# Altium PCB FullSheetOLD.PcbDoc (part 1 of 8)
Units mm, origin at the board's own origin, x right, y up, seen from the top; angles counter-clockwise.
Board outline 132.46 x 194.44 mm, 4 copper layers (Top Copper, L2_GND, L3_PWR_SIG, Bottom Copper), stack 1.586 mm thick; 495 components, 210 nets, 2171 pads, 1027 vias.
Unrouted connection lines stored in the file: 53.
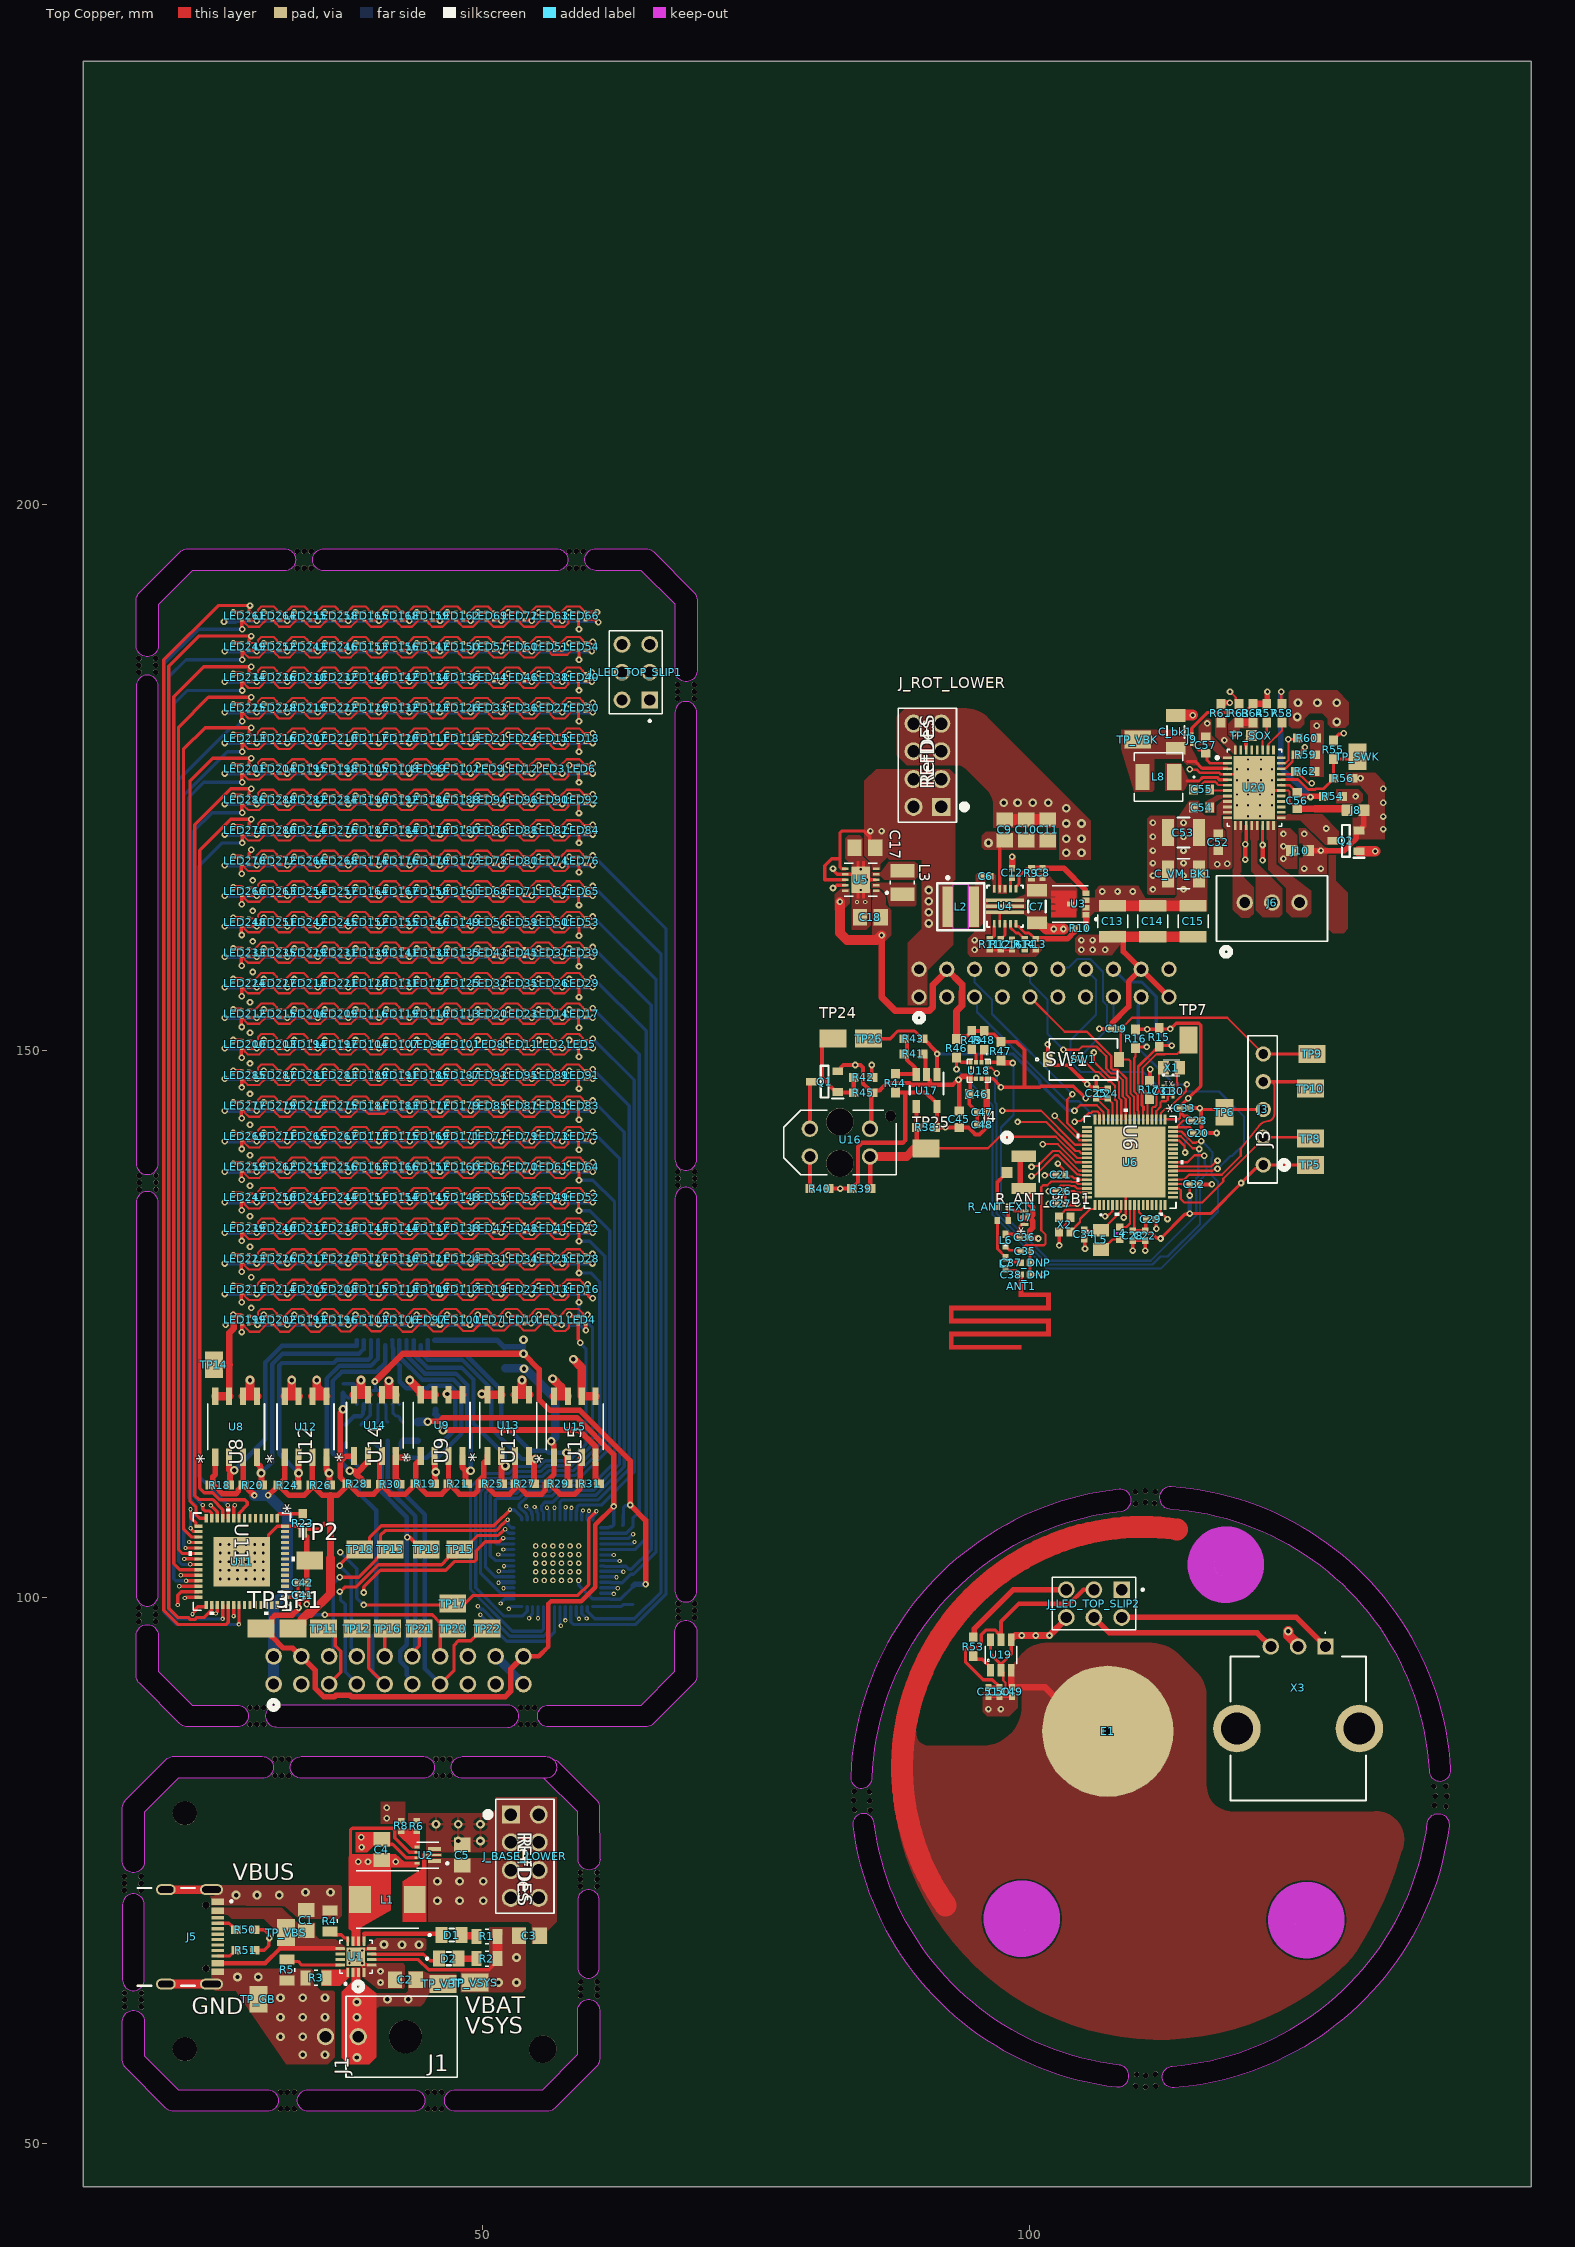
[diagram p0: Top Copper view]
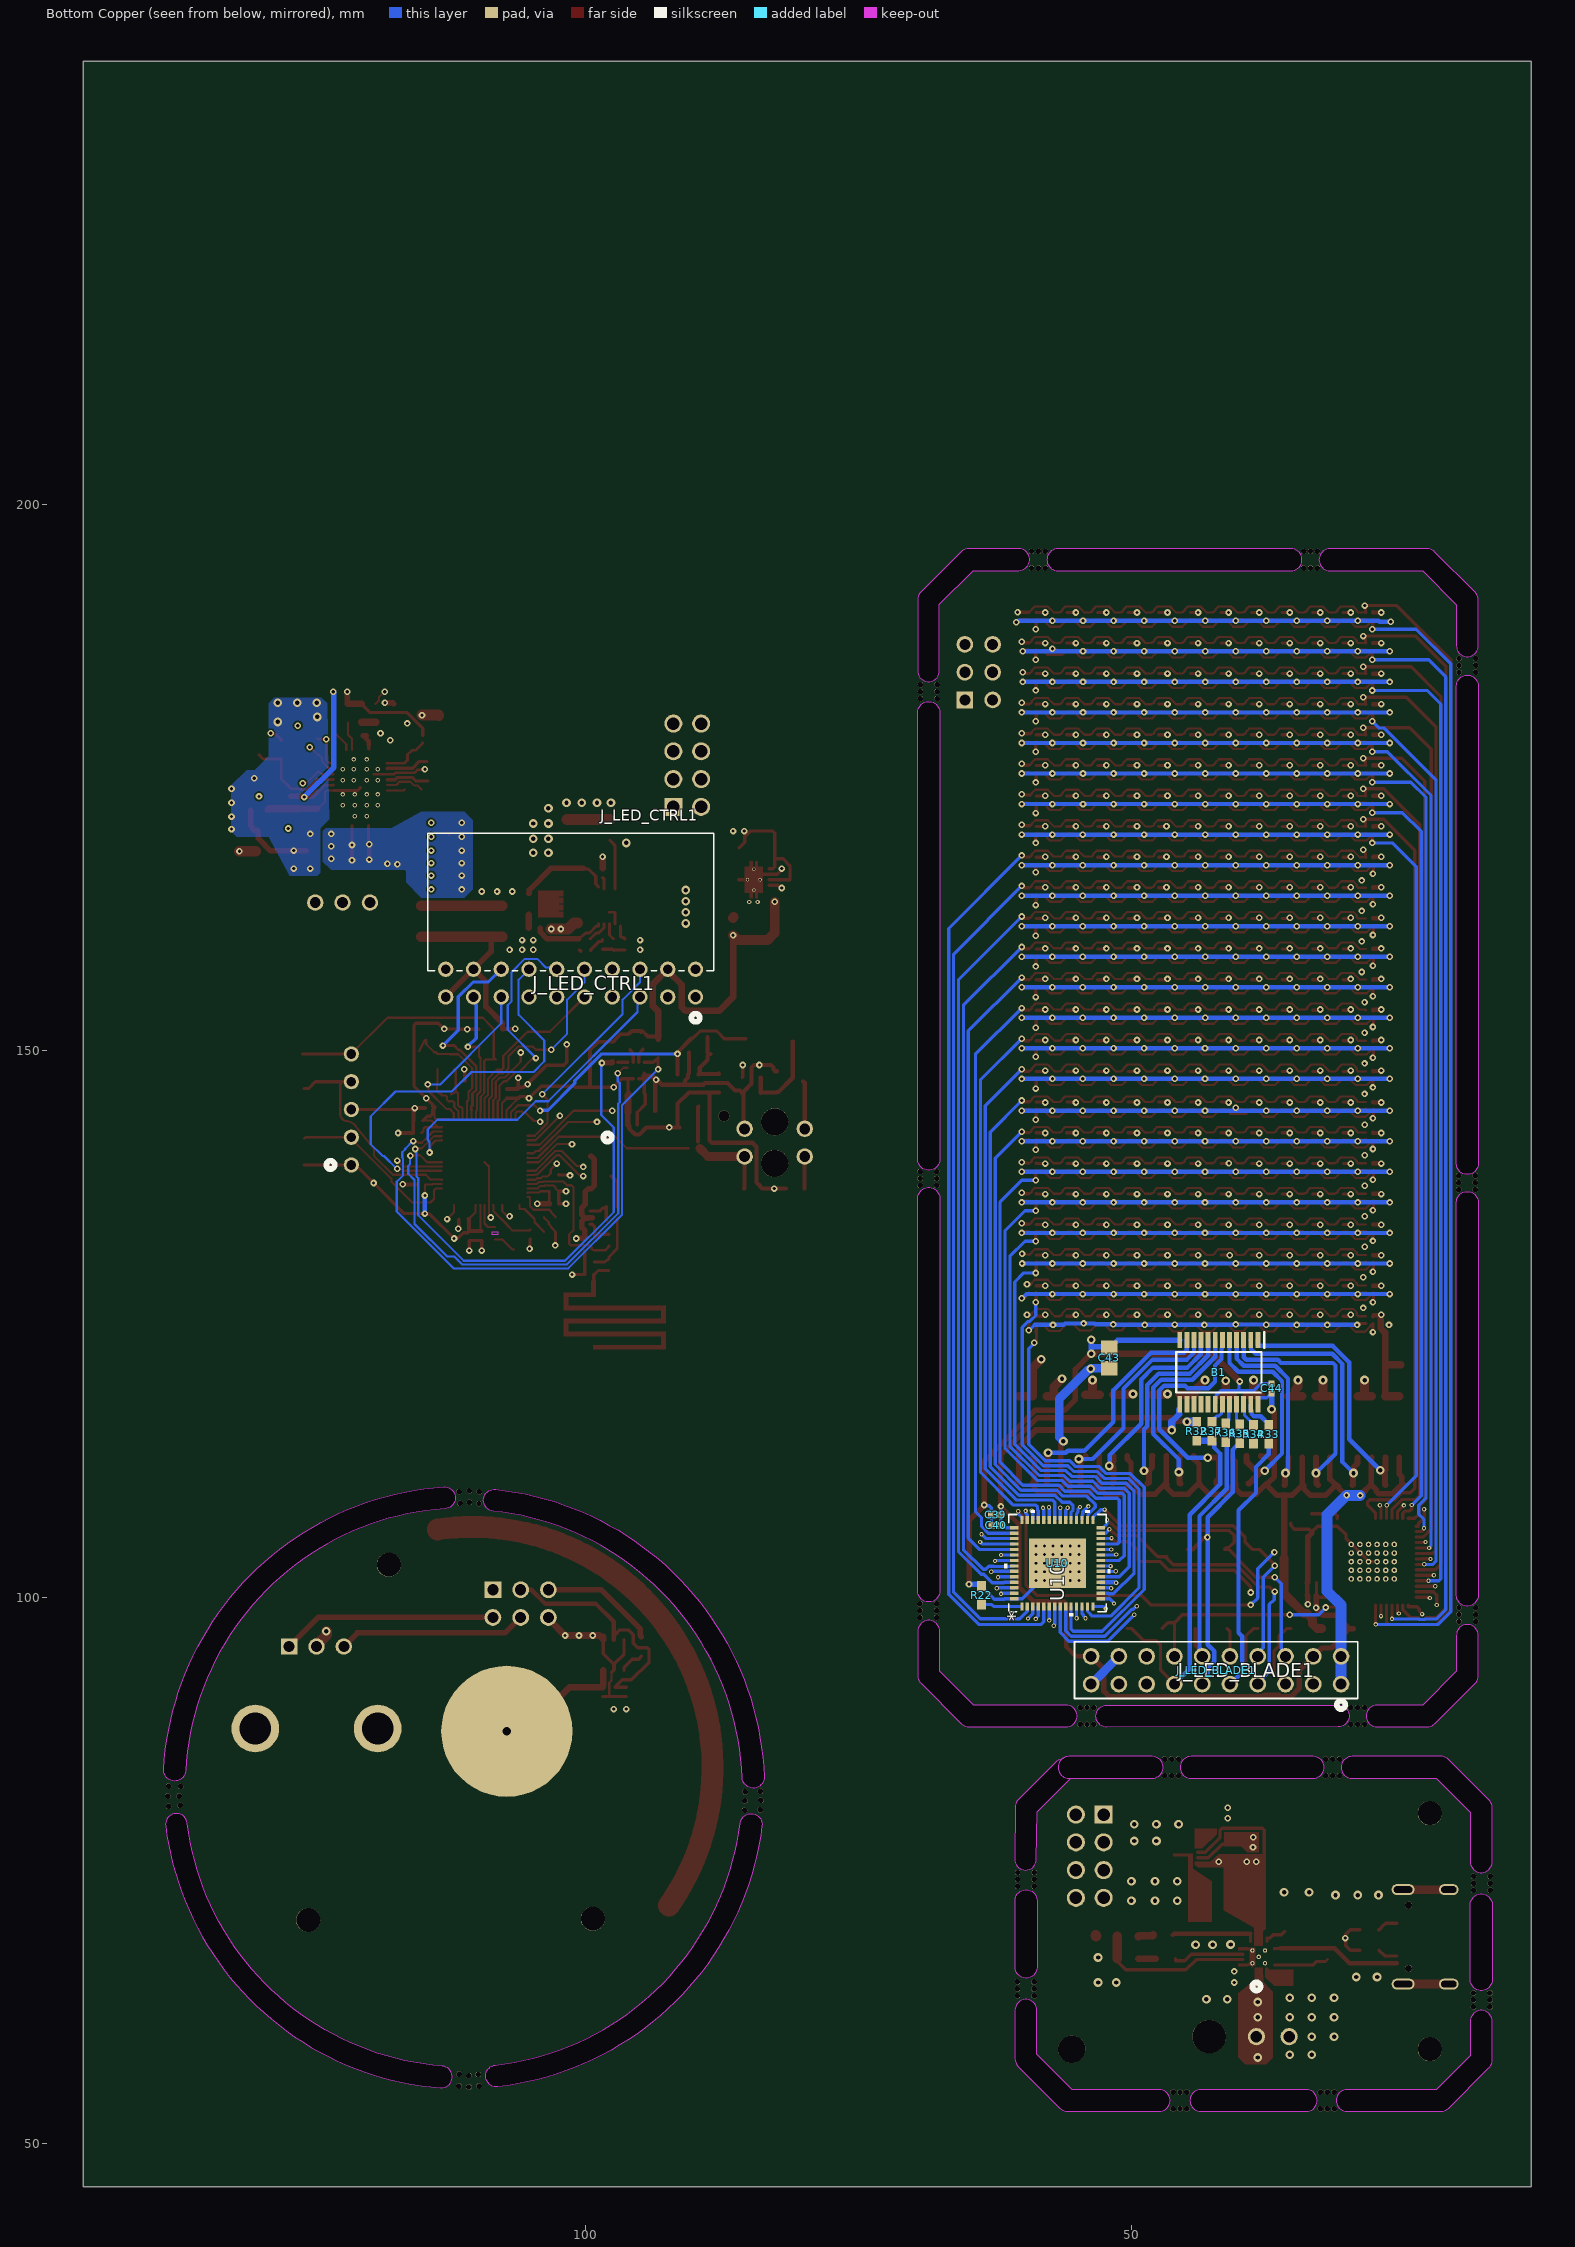
[diagram p1: Bottom Copper view, seen from below]
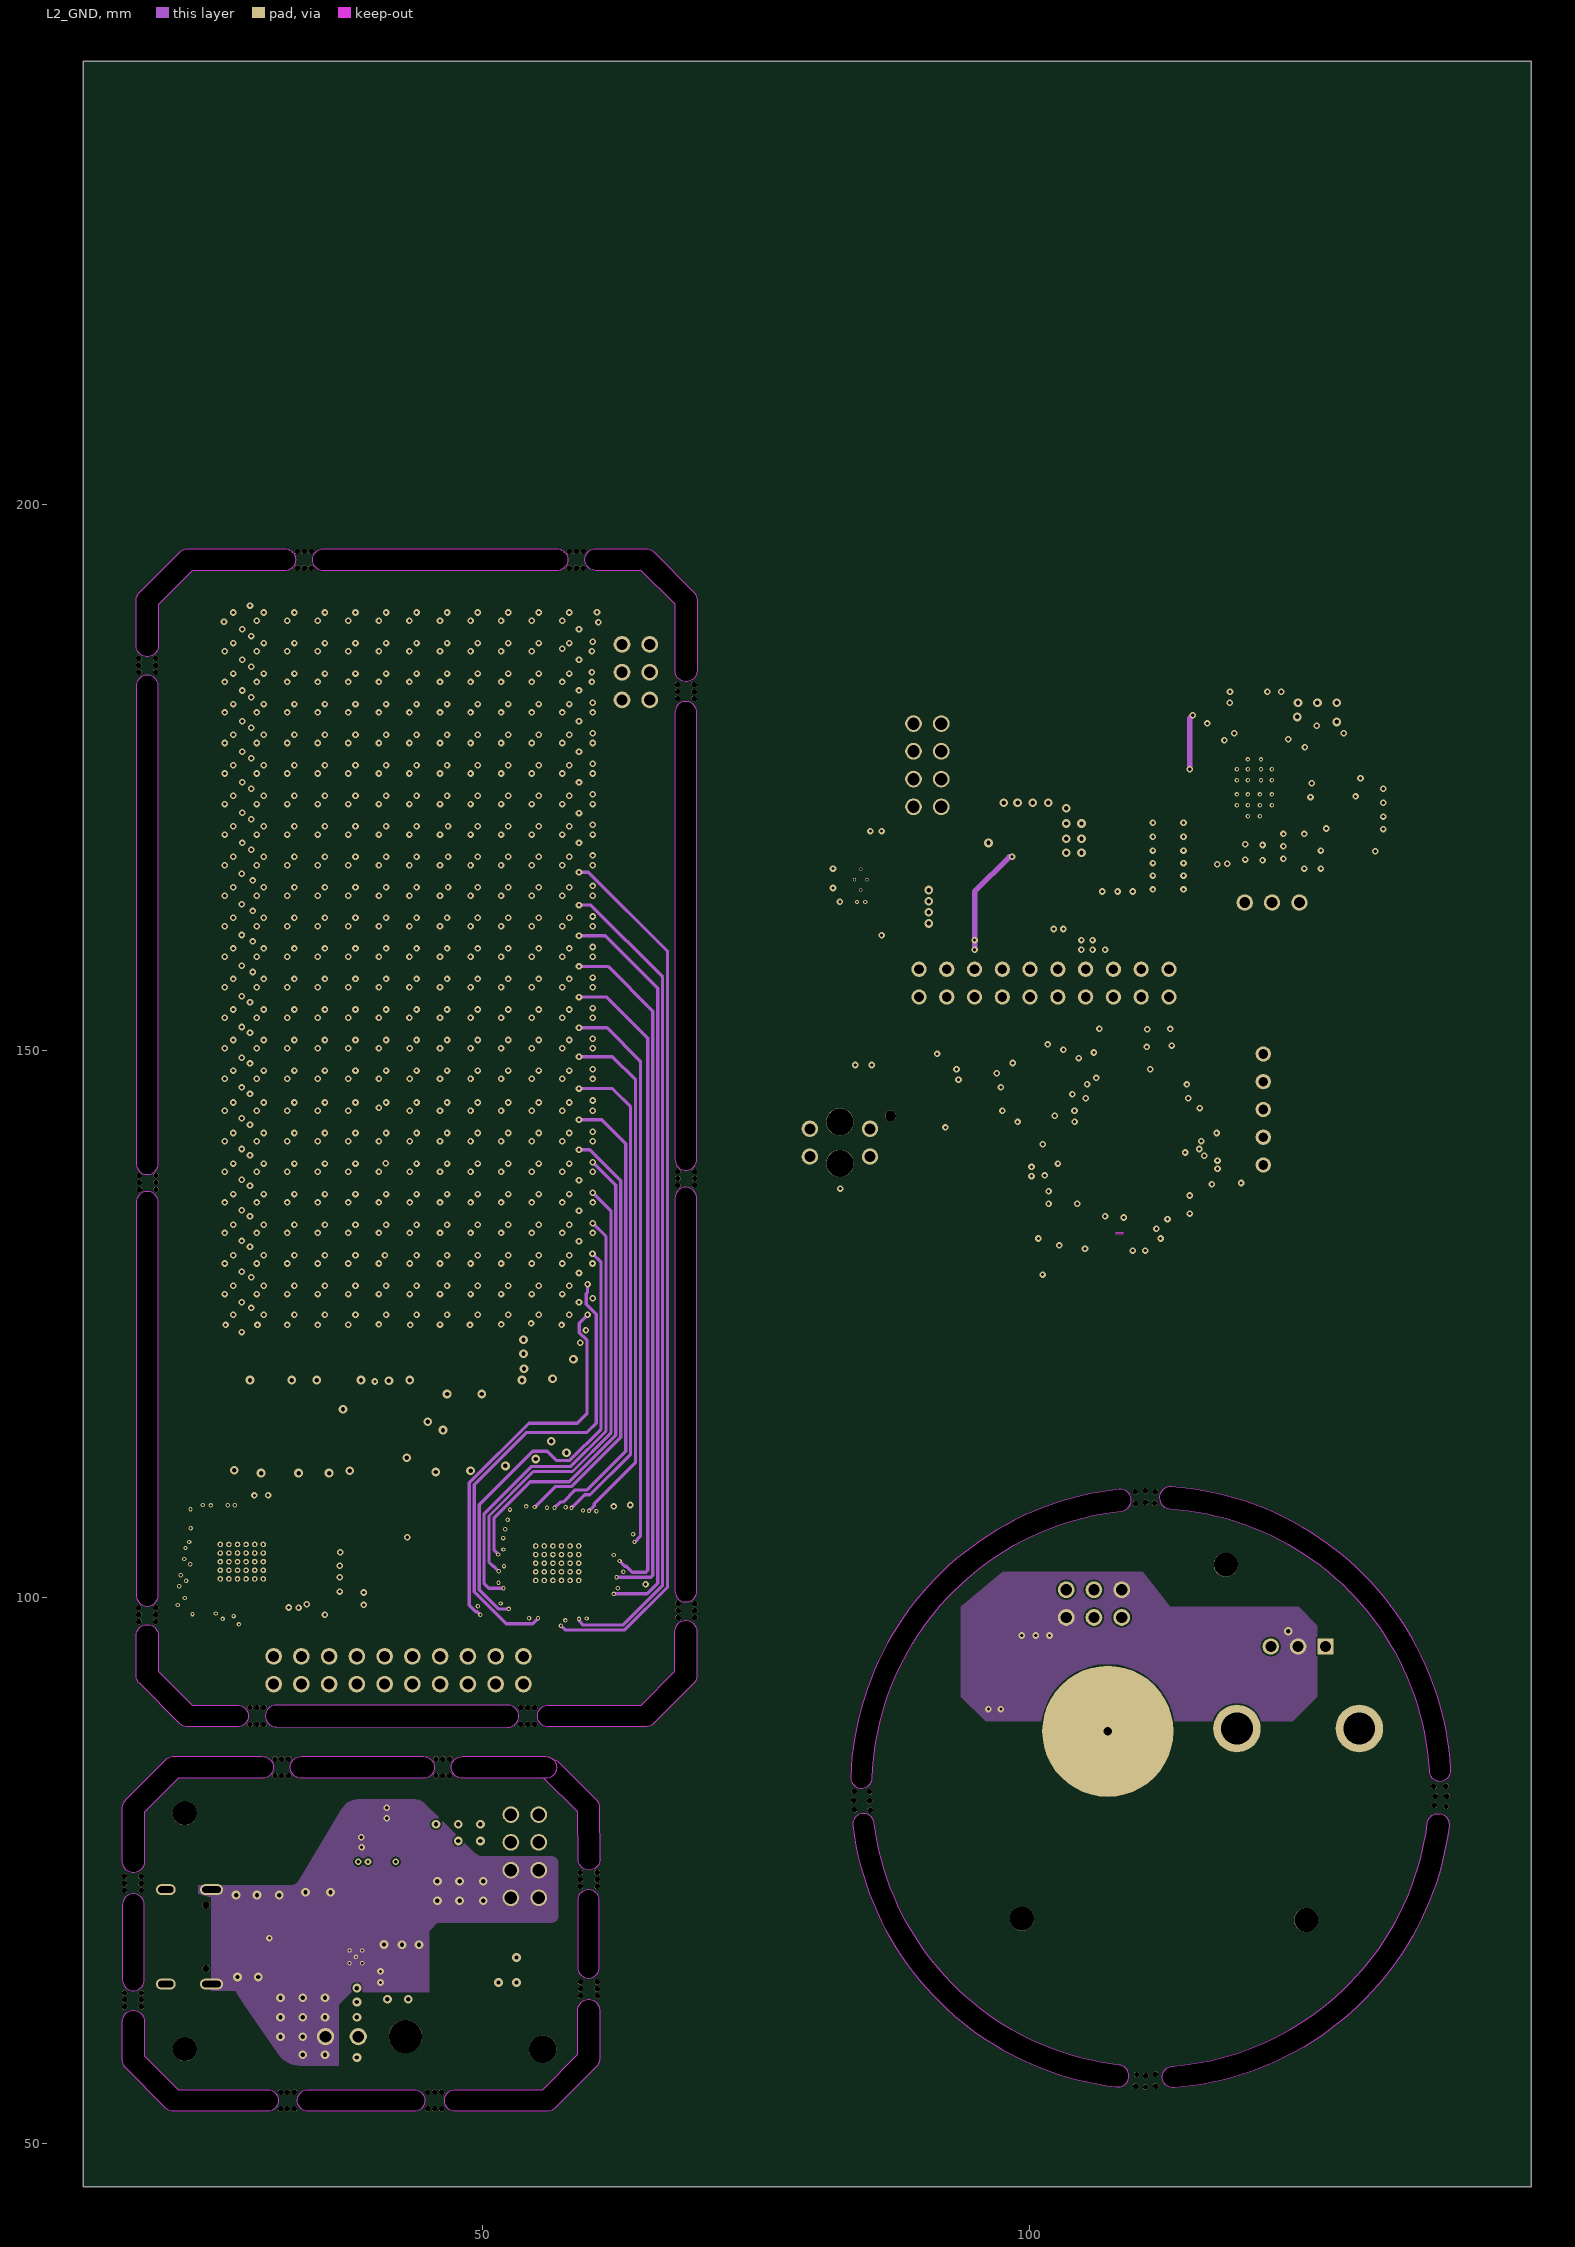
[diagram p2: L2_GND]
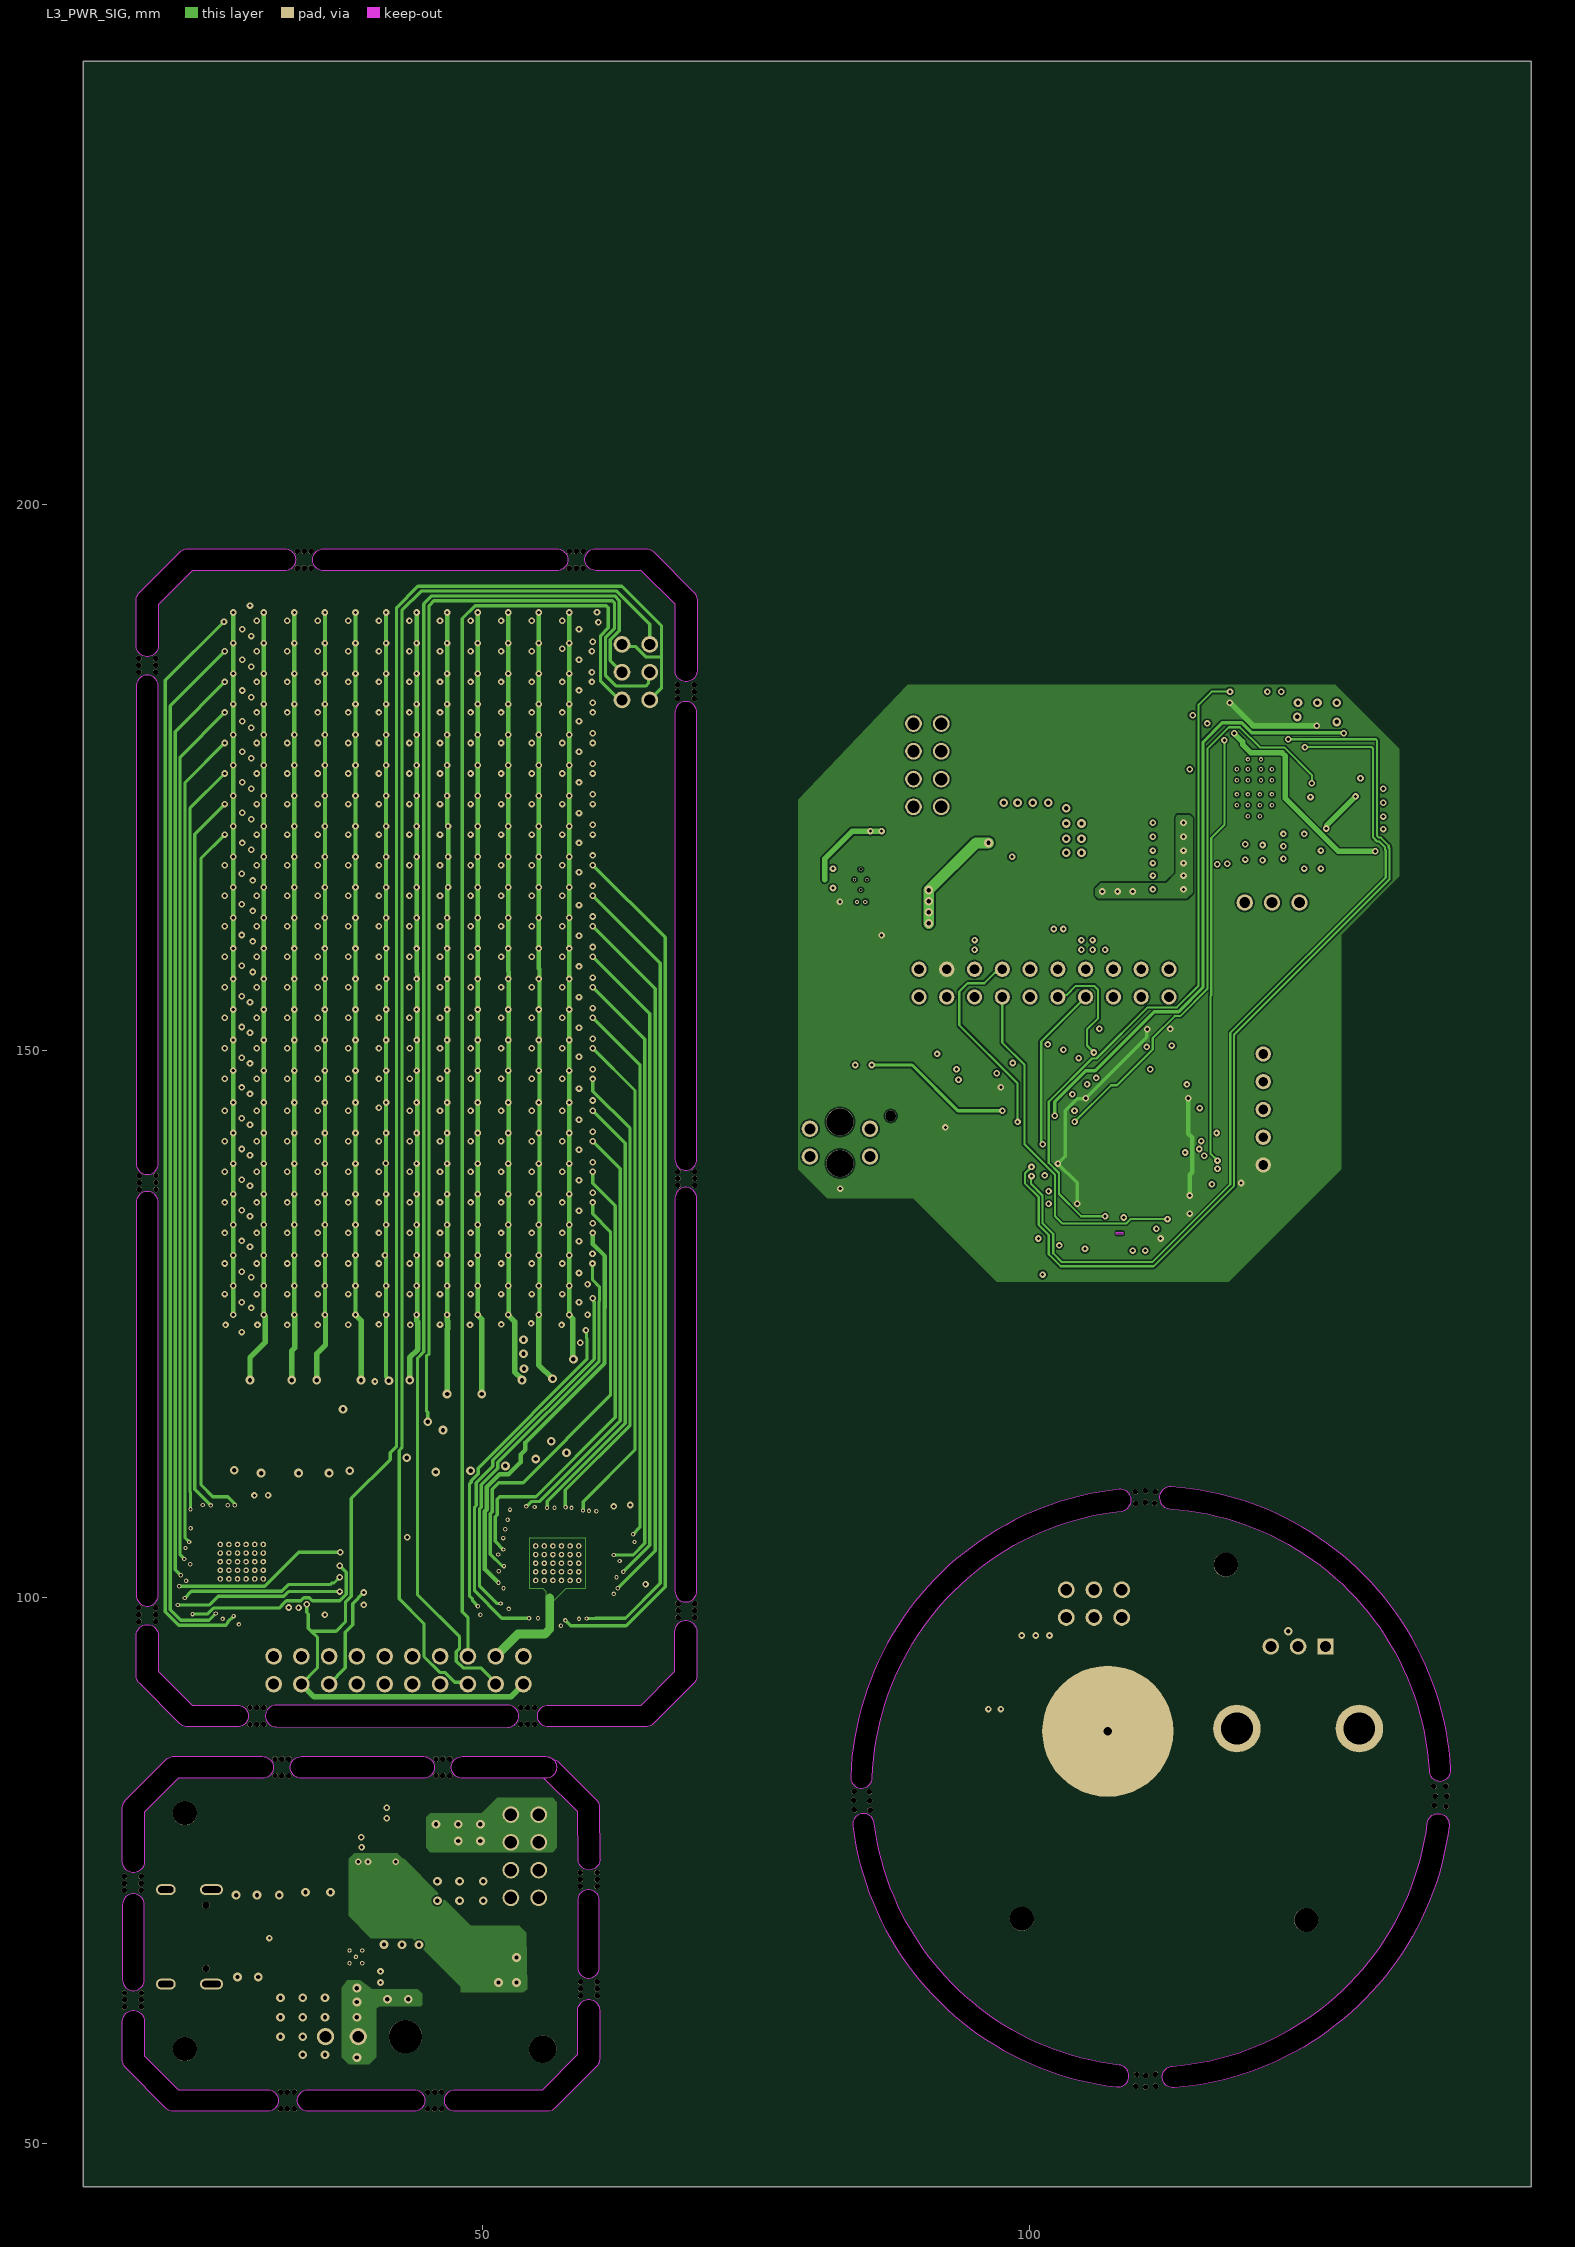
[diagram p3: L3_PWR_SIG]
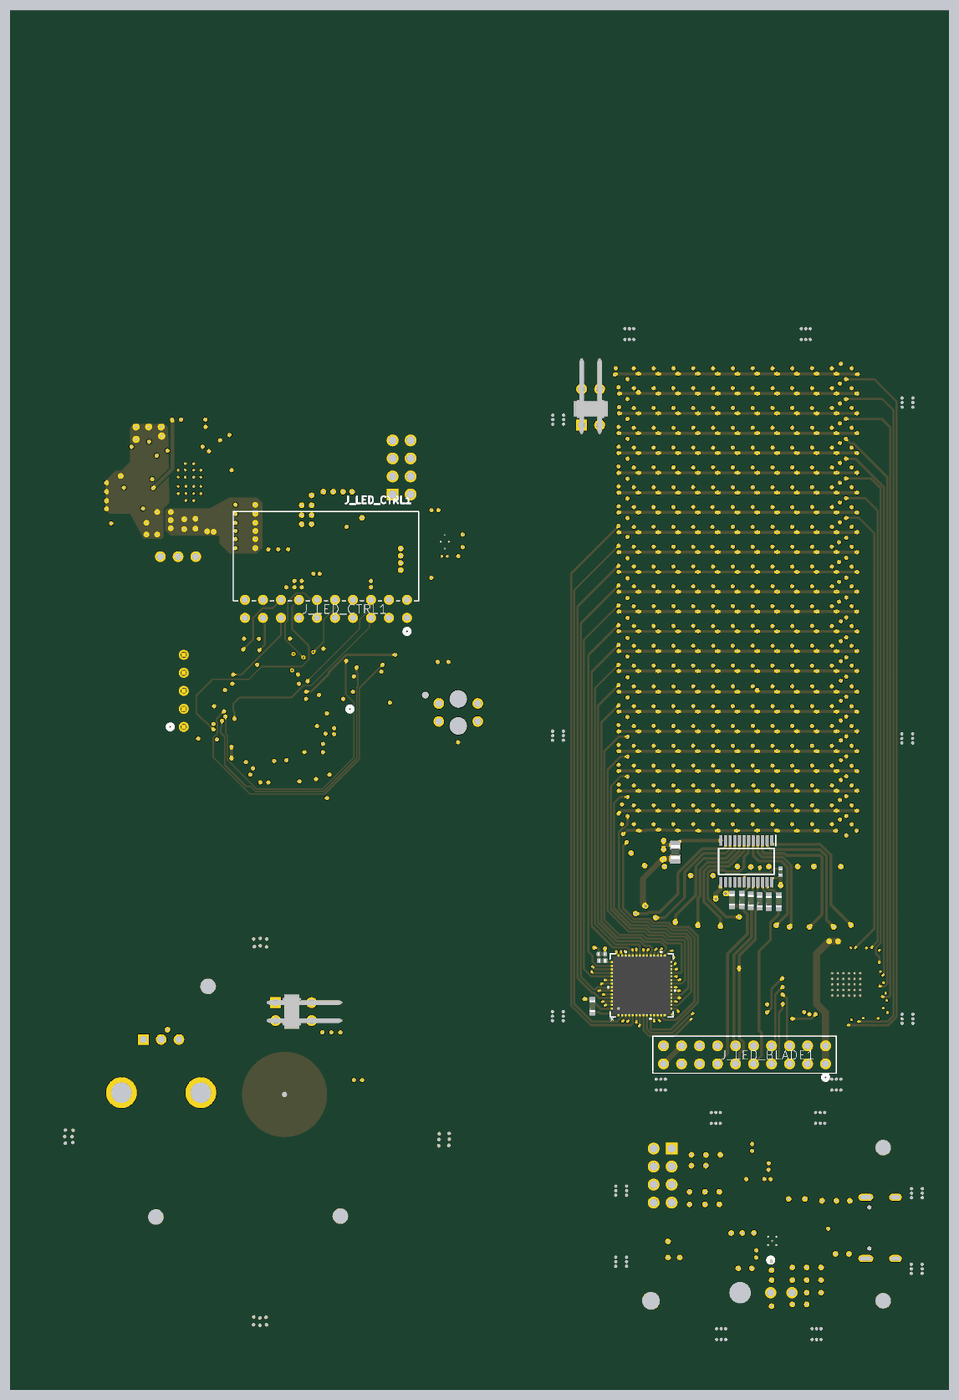
[diagram p10: 3D render of the assembled board from below, using the file's embedded part models]

## Layer stack, top to bottom
Top Mask: solder mask 0.0305, Solder Resist, Dk 3.8
Top Copper: signal copper 0.035
Dielectric 1: prepreg 0.2104, 7628, Dk 4.4
L2_GND: signal copper 0.0152
Core: core 1.065, FR-4, Dk 4.6
L3_PWR_SIG: signal copper 0.0152
Dielectric 2: prepreg 0.2104, 7628, Dk 4.4
Bottom Copper: signal copper 0.035
Bottom Mask: solder mask 0.015, Solder Resist, Dk 3.8

## Board outline
13.462,46.101 13.462,240.538 145.923,240.538 145.923,46.101
cut-out: 67.58,100.584 ccw(c68.58,100.584) 69.58,100.584 69.58,136.525 ccw(c68.58,136.525) 67.58,136.525
cut-out: 67.58,140.081 ccw(c68.58,140.081) 69.58,140.081 69.58,180.975 ccw(c68.58,180.975) 67.58,180.975
cut-out: 56.007,88.154 cw(c56.007,89.154) 56.007,90.154 64.483,90.154 67.58,93.251 67.58,96.901 cw(c68.58,96.901) 69.58,96.901 69.58,92.837 cw(c68.58,92.837) 69.287,92.13 65.604,88.447 cw(c64.897,89.154) 64.897,88.154
cut-out: 31.114,88.156 52.283,88.133 ccw(c52.284,89.134) 53.285,89.134 ccw(c52.284,89.134) 52.285,90.134 31.116,90.157 ccw(c31.115,89.156)
cut-out: 18.597,92.133 cw(c19.304,92.841) 18.304,92.841 18.304,96.52 cw(c19.304,96.52) 20.304,96.52 20.304,93.255 23.405,90.154 27.559,90.154 cw(c27.559,89.154) 28.559,89.154 cw(c27.559,89.154) 27.559,88.154 22.991,88.154 cw(c22.991,89.154) 22.283,88.447
cut-out: 18.304,100.203 ccw(c19.304,100.203) 20.304,100.203 20.304,136.144 ccw(c19.304,136.144) 18.304,136.144
cut-out: 18.304,139.7 ccw(c19.304,139.7) 20.304,139.7 20.304,183.388 ccw(c19.304,183.388) 18.304,183.388
cut-out: 60.347,193.961 cw(c60.347,194.961) 60.347,195.961 64.915,195.961 cw(c64.915,194.961) 65.623,195.668 69.31,191.982 cw(c68.602,191.274) 69.603,191.274 69.603,184.785 cw(c68.602,184.785) 67.602,184.785 67.602,190.86 64.501,193.961
cut-out: 35.433,193.945 cw(c35.433,194.945) 35.433,195.945 56.769,195.945 cw(c56.769,194.945) 57.769,194.945 cw(c56.769,194.945) 56.769,193.945
cut-out: 18.304,187.071 18.304,191.262 cw(c19.304,191.262) 18.597,191.969 22.28,195.652 cw(c22.987,194.945) 22.987,195.945 31.877,195.945 cw(c31.877,194.945) 32.877,194.945 cw(c31.877,194.945) 31.877,193.945 23.401,193.945 20.304,190.848 20.304,187.071 cw(c19.304,187.071)
cut-out: 113.25,55.132 cw(c113.173,56.129) 113.096,57.127 ccw(c111.125,82.55) 136.424,79.357 cw(c137.416,79.232) 138.417,79.232 138.409,79.106 cw(c111.125,82.55)
cut-out: 83.841,79.106 ccw(c111.125,82.55) 108.002,55.227 ccw(c108.116,56.221) 109.116,56.221 ccw(c108.116,56.221) 108.23,57.215 cw(c111.125,82.55) 85.826,79.357 ccw(c84.834,79.232)
cut-out: 83.645,83.597 ccw(c84.644,83.559) 85.644,83.521 cw(c111.125,82.55) 108.43,107.907 ccw(c108.324,108.902) 109.325,108.902 ccw(c108.324,108.902) 108.219,109.896 ccw(c111.125,82.55)
cut-out: 112.837,108.119 cw(c111.125,82.677) 136.582,84.146 ccw(c137.581,84.203) 138.581,84.203 138.58,84.261 ccw(c111.125,82.677) 112.972,110.115 ccw(c112.905,109.117)
cut-out: 112.837,108.119 cw(c111.125,82.677) 136.582,84.146 ccw(c137.581,84.203) 138.581,84.203 138.58,84.261 ccw(c111.125,82.677) 112.972,110.115 ccw(c112.905,109.117)
cut-out: 112.837,108.119 cw(c111.125,82.677) 136.582,84.146 ccw(c137.581,84.203) 138.581,84.203 138.58,84.261 ccw(c111.125,82.677) 112.972,110.115 ccw(c112.905,109.117)
cut-out: 112.837,108.119 cw(c111.125,82.677) 136.582,84.146 ccw(c137.581,84.203) 138.581,84.203 138.58,84.261 ccw(c111.125,82.677) 112.972,110.115 ccw(c112.905,109.117)
cut-out: 58.674,66.167 ccw(c59.674,66.167) 60.675,66.167 60.675,72.263 ccw(c59.674,72.263) 58.674,72.263
cut-out: 17.034,65.024 ccw(c18.034,65.024) 19.034,65.024 19.034,71.882 ccw(c18.034,71.882) 17.034,71.882
cut-out: 17.327,56.951 cw(c18.034,57.658) 17.034,57.658 17.034,61.214 cw(c18.034,61.214) 19.034,61.214 19.034,58.072 22.131,54.975 30.298,54.975 cw(c30.298,53.975) 31.299,53.975 cw(c30.298,53.975) 30.298,52.975 21.717,52.975 cw(c21.717,53.975) 21.01,53.268
cut-out: 34.036,52.975 cw(c34.036,53.975) 34.036,54.975 43.688,54.975 cw(c43.688,53.975) 44.688,53.975 cw(c43.688,53.975) 43.688,52.975
cut-out: 48.133,83.455 cw(c48.133,84.455) 48.133,85.455 55.753,85.455 cw(c55.753,84.455) 56.436,85.186 cw(c56.261,84.201) 56.968,84.908 60.374,81.503 cw(c59.666,80.796) 60.667,80.806 60.725,76.075 60.725,76.063 cw(c59.725,76.063) 58.724,76.051 58.671,80.376 55.593,83.455
cut-out: 48.133,83.455 cw(c48.133,84.455) 48.133,85.455 55.753,85.455 cw(c55.753,84.455) 56.436,85.186 cw(c56.261,84.201) 56.968,84.908 60.374,81.503 cw(c59.666,80.796) 60.667,80.806 60.725,76.075 60.725,76.063 cw(c59.725,76.063) 58.724,76.051 58.671,80.376 55.593,83.455
cut-out: 48.133,83.455 cw(c48.133,84.455) 48.133,85.455 55.753,85.455 cw(c55.753,84.455) 56.753,84.455 cw(c55.753,84.455) 55.753,83.455
cut-out: 33.401,83.455 cw(c33.401,84.455) 33.401,85.455 44.577,85.455 cw(c44.577,84.455) 45.577,84.455 cw(c44.577,84.455) 44.577,83.455
cut-out: 17.034,75.819 17.034,80.772 cw(c18.034,80.772) 17.327,81.479 21.011,85.164 cw(c21.719,84.457) 21.775,85.455 29.845,85.455 cw(c29.845,84.455) 30.845,84.455 cw(c29.845,84.455) 29.845,83.455 22.131,83.455 19.034,80.358 19.034,75.819 cw(c18.034,75.819)
cut-out: 47.498,52.975 cw(c47.498,53.975) 47.498,54.975 55.466,54.975 58.69,58.199 58.69,62.23 cw(c59.69,62.23) 60.69,62.23 60.69,57.785 cw(c59.69,57.785) 60.397,57.078 56.587,53.268 cw(c55.88,53.975) 55.88,52.975

## Design rules (kind name [scope] priority, off if disabled: settings)
BoardOutlineClearance [All] p1: gap=0.3 ignorepadtopadclearanceinfootprint=FALSE
Clearance [All] p1: gap=0.15 ignorepadtopadclearanceinfootprint=TRUE
ComponentClearance "J2 Net Tie Override" [All vs InComponent('J2')] p1: gap=-1 collisioncheckmode=3 verticalgap=0.254 showdistances=FALSE
ComponentClearance [All] p2: gap=0.254 collisioncheckmode=3 verticalgap=0.254 showdistances=FALSE
HoleToHoleClearance [All] p1: gap=0.25 allowstackedmicrovias=TRUE
MinimumAnnularRing [All] p1: minimumring=0.15
MinimumSolderMaskSliver [All] p1: minsoldermaskwidth=0.1
PolygonConnect 5V_BASE_L01_P000 [All vs IsNamedPolygon('5V_BASE_L01_P000')] p1: thpad.connectstyle=Direct thpad.reliefconductorwidth=0.254 thpad.reliefentries=4 thpad.polygonreliefangle="90 Angle" thpad.airgapwidth=0.254 smdpad.connectstyle=Direct smdpad.reliefconductorwidth=0.254 smdpad.reliefentries=4 smdpad.polygonreliefangle="90 Angle" smdpad.airgapwidth=0.254 via.connectstyle=Relief via.reliefconductorwidth=0.254 via.reliefentries=4 via.polygonreliefangle="90 Angle" via.airgapwidth=0.254
PolygonConnect PowerConnect [All vs InNetClass('POWER_DIR')] p2: connectstyle=Direct reliefconductorwidth=0.254 reliefentries=4 polygonreliefangle="90 Angle" airgapwidth=0.254
PolygonConnect [All] p3: connectstyle=Direct reliefconductorwidth=0.254 reliefentries=4 polygonreliefangle="90 Angle" airgapwidth=0.254
RoutingVias [All] p1: holewidth=0.3 width=0.6 viastyle="Through Hole" minholewidth=0.711 minwidth=1.27 maxholewidth=0.711 maxwidth=1.27
SolderMaskExpansion [All] p1: expansion=0.102 istentingtop=FALSE
SupplyNets "Schematic Supply Nets_1" [InNet('GND_ROT')] p1: voltage=0.000
SupplyNets "Schematic Supply Nets_17" [InNet('VBUS')] p2: voltage=0.000
SupplyNets "Schematic Supply Nets_16" [InNet('DGND')] p3: voltage=0.000
SupplyNets "Schematic Supply Nets_15" [InNet('5V_BASE')] p4: voltage=0.000
SupplyNets "Schematic Supply Nets_14" [InNet('GND_TOP')] p5: voltage=0.000
SupplyNets "Schematic Supply Nets_13" [InNet('AGND')] p6: voltage=0.000
SupplyNets "Schematic Supply Nets_12" [InNet('PGND')] p7: voltage=0.000
SupplyNets "Schematic Supply Nets_11" [InNet('VBAT')] p8: voltage=0.000
SupplyNets "Schematic Supply Nets_10" [InNet('GND_LED')] p9: voltage=0.000
SupplyNets "Schematic Supply Nets_8" [InNet('VSYS')] p10: voltage=0.000
SupplyNets "Schematic Supply Nets_7" [InNet('GND_BASE')] p11: voltage=0.000
SupplyNets "Schematic Supply Nets_6" [InNet('+3V3_LED')] p12: voltage=0.000
SupplyNets "Schematic Supply Nets_5" [InNet('VMOTOR_ROT')] p13: voltage=0.000
SupplyNets "Schematic Supply Nets_4" [InNet('+3V3_TOP')] p14: voltage=0.000
SupplyNets "Schematic Supply Nets_3" [InNet('5V_LED')] p15: voltage=0.000
SupplyNets "Schematic Supply Nets_2" [InNet('+3V3_ROT')] p16: voltage=0.000
SupplyNets "Schematic Supply Nets" [InNet('5V_ROT')] p17: voltage=0.000
Width TOUCH_override [InNet('NetC49_2')] p1: maxlimit=2 minlimit=0.254 preferedwidth=0.254 toplayer_minwidth=2 toplayer_prefwidth=2 midlayer1_maxwidth=0.254 midlayer2_maxwidth=0.254 bottomlayer_maxwidth=0.254 minimp=50.000000 maximp=50.000000 favimp=50.000000
Width [All] p2: maxlimit=1 minlimit=0.125 preferedwidth=0.3 minimp=50.000000 maximp=50.000000 favimp=50.000000
27 further rules are at their usual default settings.

## Classes and differential pairs
net class POWER_DIR: 5V_BASE 5V_LED 5V_ROT +3V3_ROT GND_BASE GND_LED GND_ROT MOTOR_U MOTOR_V MOTOR_W NetL3_1 NetL3_2 PGND VBAT VBUS VMOTOR_ROT VSYS
pad class DC_Pad: U1-18 U1-19 U1-20
component class USB: J5 R50 R51
component class SIDE: C49 C50 C51 E1 J_LED_TOP_SLIP2 R53 U19 X3
component class SENS: C45 C46 C47 C48 Q1 R38 R39 R40 R41 R42 R43 R44 R45 R46 R47 R48 R49 TP24 TP25 TP26 U16 U17 U18
component class RF: ANT1 C35 C36 C37_DNP C38_DNP J4 L6 L7 R_ANT_EXT1 R_ANT_PCB1 U7
component class REG: C6 C7 C8 C9 C10 C11 C12 C13 C14 C15 C16 C17 C18 J_BASE_LOWER J_ROT_LOWER L2 L3 R9 R10 R11 R12 R13 R14 U3 U4 U5
component class MTR: C52 C53 C54 C55 C56 C57 C_bk1 C_VM_BK1 J6 J8 J9 J10 L8 Q2 R54 R55 R56 R57 R58 R59 R60 R61 R62 R63 R64 TP_SOX TP_SWK TP_VBK U20
component class MCU: C19 C20 C21 C22 C23 C24 C25 C26 C27 C28 C29 C30 C31 C32 C33 C34 J3 J_LED_CTRL1 L4 L5 R15 R16 R17 SW1 TP5 TP6 TP7 TP8 TP9 TP10 U6 X1 X2
component class LED: B1 C39 C40 C41 C42 C43 C44 J_LED_BLADE1 J_LED_TOP_SLIP1 LED1 LED2 LED3 LED4 LED5 LED6 LED7 LED8 LED9 LED10 LED11 LED12 LED13 LED14 LED15 LED16 LED17 LED18 LED19 LED20 LED21 LED22 LED23 LED24 LED25 LED26 LED27 LED28 LED29 LED30 LED31 LED32 LED33 LED34 LED35 LED36 LED37 LED38 LED39 LED40 LED41 LED42 LED43 LED44 LED45 LED46 LED47 LED48 LED49 LED50 LED51 LED52 LED53 LED54 LED55 LED56 LED57 LED58 LED59 LED60 LED61 LED62 LED63 LED64 LED65 LED66 LED67 LED68 LED69 LED70 LED71 LED72 LED73 LED74 LED75 LED76 LED77 LED78 LED79 LED80 LED81 LED82 LED83 LED84 LED85 LED86 LED87 LED88 LED89 LED90 LED91 LED92 LED93 LED94 LED95 LED96 LED97 LED98 LED99 LED100 LED101 LED102 LED103 LED104 LED105 LED106 LED107 LED108 LED109 LED110 LED111 LED112 LED113 LED114 LED115 LED116 LED117 LED118 LED119 LED120 LED121 LED122 LED123 LED124 LED125 LED126 LED127 LED128 LED129 LED130 LED131 LED132 LED133 LED134 LED135 LED136 LED137 LED138 LED139 LED140 LED141 LED142 LED143 LED144 LED145 LED146 LED147 LED148 LED149 LED150 LED151 LED152 LED153 LED154 LED155 LED156 LED157 LED158 LED159 LED160 LED161 LED162 LED163 LED164 LED165 LED166 LED167 LED168 LED169 LED170 LED171 LED172 LED173 LED174 LED175 LED176 LED177 LED178 LED179 LED180 LED181 LED182 LED183 LED184 LED185 LED186 LED187 LED188 LED189 LED190 LED191 LED192 LED193 LED194 LED195 LED196 LED197 LED198 LED199 LED200 LED201 LED202 LED203 LED204 LED205 LED206 LED207 LED208 LED209 LED210 LED211 LED212 LED213 LED214 LED215 LED216 LED217 LED218 LED219 LED220 LED221 LED222 LED223 LED224 LED225 LED226 LED227 LED228 LED229 LED230 LED231 LED232 LED233 LED234 LED235 LED236 LED237 LED238 LED239 LED240 LED241 LED242 LED243 LED244 LED245 LED246 LED247 LED248 LED249 LED250 LED251 LED252 LED253 LED254 LED255 LED256 LED257 LED258 LED259 LED260 LED261 LED262 LED263 LED264 LED265 LED266 LED267 LED268 LED269 LED270 LED271 LED272 LED273 LED274 LED275 LED276 LED277 LED278 LED279 LED280 LED281 LED282 LED283 LED284 LED285 LED286 LED287 LED288 R18 R19 R20 R21 R22 R23 R24 R25 R26 R27 R28 R29 R30 R31 R32 R33 R34 R35 R36 R37 TP1 TP2 TP3 TP11 TP12 TP13 TP14 TP15 TP16 TP17 TP18 TP19 TP20 TP21 TP22 U8 U9 U10 U11 U12 U13 U14 U15
component class CHG: C1 C2 C3 C4 C5 D1 D2 J1 L1 R1 R2 R3 R4 R5 R6 R8 t TP_GB TP_VBS TP_VBT TP_VSYS U1 U2 VBS

## Components (designator, comment, footprint, x,y, rotation, side; value= is the part's Value field where it differs from the comment)
ANT1 "ANT_2G4" ANT_PCB_MEANDER_2G4_ST_AN5129 99.259,128.495 r180 top
B1 "74HCT154PW_118" SOP65P640X110-24N 42.043,120.616 r270 bottom
C1 "1uF" CAPC2012X70 33.858,70.46 r270 top
C2 "4.7uF" CAPC2012X70 42.926,65.024 r0 top
C3 "4.7uF" CAPC2012X70 54.254,69.063 r180 top
C4 "10uF" CAPC2012X70 40.767,76.937 r270 top
C5 "10uF" CAPC2012X70 48.133,76.429 r90 top
C6 "100nF" FP-AC0402-IPC_B 96.012,165.989 r180 top
C7 "4.7uF" CAPC1206(3216)100_N 100.711,163.219 r90 top
C8 "22nF" FP-AC0402-IPC_B 101.219,166.291 r270 top
C9 "22uF" CAPC2012X70 97.744,170.222 r270 top
C10 "22uF" CAPC2012X70 99.721,170.22 r270 top
C11 "22uF" CAPC2012X70 101.681,170.227 r270 top
C12 "4.7uF" FP-AC0402-IPC_B 98.425,166.291 r270 top
C13 "22uF" G-32_MUR 107.624,161.87 r90 top
C14 "22uF" G-32_MUR 111.307,161.87 r90 top
C15 "22uF" G-32_MUR 114.99,161.87 r90 top
C16 "1nF" FP-AC0402-IPC_B 98.425,159.738 r90 top
C17 "10uF" CAPC2012X70 84.963,168.595 r0 top
C18 "47uF" CAPC2012X70 85.471,162.245 r0 top
C19 "100nF" FP-AC0402-IPC_B 107.95,152.019 r0 top
C20 "4.7uF" FP-AC0402-IPC_B 115.443,142.494 r180 top
C21 "100nF" FP-AC0402-IPC_B 102.87,138.684 r0 top
C22 "100nF" FP-AC0402-IPC_B 110.617,133.096 r90 top
C23 "100nF" FP-AC0402-IPC_B 115.316,143.637 r180 top
C24 "10nF" FP-AC0402-IPC_B 107.188,146.098 r270 top
C25 "1uF" FP-AC0402-IPC_B 106.108,146.116 r270 top
C26 "100pF" FP-AC0402-IPC_B 102.87,137.16 r0 top
C27 "100nF" FP-AC0402-IPC_B 102.87,136.017 r0 top
C28 "4.7uF" FP-AC0402-IPC_B 109.474,133.096 r90 top
C29 "100nF" FP-AC0402-IPC_B 111.125,134.62 r180 top
C30 "10pF" G-033_MUR 113.157,146.304 r270 top
C31 "10pF" G-033_MUR 112.268,146.301 r270 top
C32 "100nF" FP-AC0402-IPC_B 115.11,137.795 r180 top
C33 "100nF" FP-AC0402-IPC_B 114.221,144.78 r180 top
C34 "4.7uF" FP-AC0402-IPC_B 105.029,133.223 r90 top
C35 "0.8pF" FP-AC0402-IPC_B 99.638,131.694 r0 top
C36 "0.3pF" FP-AC0402-IPC_B 99.568,132.969 r180 top
C37_DNP "Cap" FP-AC0402-IPC_B 99.617,130.615 r0 top
C38_DNP "Cap" FP-AC0402-IPC_B 99.619,129.54 r0 top
C39 "4.7uF" FP-AC0402-IPC_B 62.436,107.569 r180 bottom
C40 "100nF" FP-AC0402-IPC_B 62.387,106.601 r180 bottom
C41 "100nF" FP-AC0402-IPC_B 33.528,100.203 r180 top
C42 "4.7uF" FP-AC0402-IPC_B 33.528,101.346 r180 top
C43 "47uF" CAPC2012X70 52.07,121.92 r270 bottom
C44 "100nF" FP-AC0402-IPC_B 37.211,119.126 r270 bottom
C45 "100nF" FP-CC0603-DA-MFG 93.599,143.752 r90 top
C46 "10uF" FP-CC0603-DA-MFG 95.262,146.05 r180 top
C47 "100nF" FP-AC0402-IPC_B 95.679,144.399 r0 top
C48 "100nF" FP-AC0402-IPC_B 95.679,143.256 r0 top
C49 "10pF" FP-AC0402-IPC_B 98.425,91.361 r90 top
C50 "1uF" FP-AC0402-IPC_B 97.282,91.361 r90 top
C51 "100nF" FP-AC0402-IPC_B 96.266,91.361 r90 top
C52 "100nF" FP-CC0603-DA-MFG 117.284,169.1 r90 top
C53 "22uF" G-32_MUR 114.109,169.989 r0 top
C54 "1uF" FP-CC0603-DA-MFG 115.772,172.275 r0 top
C55 "47nF" FP-CC0603-DA-MFG 115.772,173.927 r180 top value="47 nF"
C56 "1uF" FP-CC0603-DA-MFG 124.523,172.91 r270 top
C57 "1uF" FP-CC0603-DA-MFG 116.141,177.99 r270 top
C_bk1 "22uF" CAPC1206(3216)100_N 113.411,179.197 r270 top
C_VM_BK1 "22uF" G-32_MUR 114.109,166.201 r180 top
D1 "LED" LEDC2012X120N 47.142,69.113 r0 top
D2 "LED" LEDC2012X120N 46.899,66.954 r0 top
E1 "Touch-Pad-TTP" Touch_Pad_Surface 107.188,87.757 r0 top
J1 "430450200" CONN_SD-43045-001_02_MOL 38.606,59.817 r90 top
J3 "TSW-105-23-S-S" CON5_1X5_TU_TSW 121.412,144.653 r90 top
J4 "U.FL-R-SMT-1(01)" COAX2_U.FL-R-SMT-101_HIR 99.496,138.889 r270 top
J5 "USB4105-GF-A" GCT_USB4105-GF-A 21.001,68.949 r270 top
J6 "B3B-XH-A" CONN_B3B-XH-A_JST 119.714,163.576 r180 top
J8 "2 way net tie junction" 2WAY_MP 129.857,172.022 r180 top net-tie
J9 "2 way net tie junction" 2WAY_LP 114.871,178.524 r270 top net-tie
J10 "2 way net tie junction" 2WAY_MP 124.777,168.338 r0 top net-tie
J_BASE_LOWER "SLIP_RING_8W" TSW-104-07-G-D_SAI 52.578,80.137 r270 top
J_LED_BLADE1 "SSW-110-01-T-D" CONN_2X10_TU_SSQ_SAI 42.291,93.345 r180 bottom
J_LED_CTRL1 "TSW-110-08-L-D-RA" CON20_2X10_TR_TSW_SAI 101.346,156.21 r180 bottom
J_LED_TOP_SLIP1 "10129381-906002BLF" AMPHENOL_10129381-906002BLF 64.008,184.658 r90 top
J_LED_TOP_SLIP2 "10129381-906002BLF" AMPHENOL_10129381-906002BLF 105.918,99.441 r180 top
J_ROT_LOWER "SLIP_RING_8W" TSW-104-07-G-D_SAI 91.948,172.339 r90 top
L1 "ASPI-0530HI-1R0M-T2" IND_ASPI-0530HI-1R0M-T2 41.275,72.365 r0 top
L2 "WE-MXGI_4020" WE-MXGI_4020 93.726,163.195 r0 top
L3 "LQM2HPN1R5MG0L" INDC2520X100N 88.392,165.42 r90 top
L4 "10nH" IND_LQG15W_MUR 108.27,133.329 r90 top
L5 "10uH" "IND_LQM21FN100M80L_MUR - duplicate" 106.553,132.715 r270 top
L6 "2.7 nH" IND_LQG15_MUR 97.841,132.702 r90 top value=2.7nH
L7 "Ind" IND_LQG15_MUR 97.841,130.556 r270 top
L8 "LQH44PN470MPRL" IND_LQH44PN_PR_MUR 111.823,175.07 r180 top
LED1 "UHD111A-FKA-C3K23E1L3VG5ZB3Z3" SMD4_UHD111A-FKA_CRW 56.27,125.4 r90 top
LED2 "UHD111A-FKA-C3K23E1L3VG5ZB3Z3" SMD4_UHD111A-FKA_CRW 56.27,150.6 r90 top
LED3 "UHD111A-FKA-C3K23E1L3VG5ZB3Z3" SMD4_UHD111A-FKA_CRW 56.27,175.8 r90 top
LED4 "UHD111A-FKA-C3K23E1L3VG5ZB3Z3" SMD4_UHD111A-FKA_CRW 59.07,125.4 r90 top
LED5 "UHD111A-FKA-C3K23E1L3VG5ZB3Z3" SMD4_UHD111A-FKA_CRW 59.07,150.6 r90 top
LED6 "UHD111A-FKA-C3K23E1L3VG5ZB3Z3" SMD4_UHD111A-FKA_CRW 59.07,175.8 r90 top
LED7 "UHD111A-FKA-C3K23E1L3VG5ZB3Z3" SMD4_UHD111A-FKA_CRW 50.67,125.4 r90 top
LED8 "UHD111A-FKA-C3K23E1L3VG5ZB3Z3" SMD4_UHD111A-FKA_CRW 50.67,150.6 r90 top
LED9 "UHD111A-FKA-C3K23E1L3VG5ZB3Z3" SMD4_UHD111A-FKA_CRW 50.67,175.8 r90 top
LED10 "UHD111A-FKA-C3K23E1L3VG5ZB3Z3" SMD4_UHD111A-FKA_CRW 53.47,125.4 r90 top
LED11 "UHD111A-FKA-C3K23E1L3VG5ZB3Z3" SMD4_UHD111A-FKA_CRW 53.47,150.6 r90 top
LED12 "UHD111A-FKA-C3K23E1L3VG5ZB3Z3" SMD4_UHD111A-FKA_CRW 53.47,175.8 r90 top
LED13 "UHD111A-FKA-C3K23E1L3VG5ZB3Z3" SMD4_UHD111A-FKA_CRW 56.27,128.2 r90 top
LED14 "UHD111A-FKA-C3K23E1L3VG5ZB3Z3" SMD4_UHD111A-FKA_CRW 56.27,153.4 r90 top
LED15 "UHD111A-FKA-C3K23E1L3VG5ZB3Z3" SMD4_UHD111A-FKA_CRW 56.27,178.6 r90 top
LED16 "UHD111A-FKA-C3K23E1L3VG5ZB3Z3" SMD4_UHD111A-FKA_CRW 59.07,128.2 r90 top
LED17 "UHD111A-FKA-C3K23E1L3VG5ZB3Z3" SMD4_UHD111A-FKA_CRW 59.07,153.4 r90 top
LED18 "UHD111A-FKA-C3K23E1L3VG5ZB3Z3" SMD4_UHD111A-FKA_CRW 59.07,178.6 r90 top
LED19 "UHD111A-FKA-C3K23E1L3VG5ZB3Z3" SMD4_UHD111A-FKA_CRW 50.67,128.2 r90 top
LED20 "UHD111A-FKA-C3K23E1L3VG5ZB3Z3" SMD4_UHD111A-FKA_CRW 50.67,153.4 r90 top
LED21 "UHD111A-FKA-C3K23E1L3VG5ZB3Z3" SMD4_UHD111A-FKA_CRW 50.67,178.6 r90 top
LED22 "UHD111A-FKA-C3K23E1L3VG5ZB3Z3" SMD4_UHD111A-FKA_CRW 53.47,128.2 r90 top
LED23 "UHD111A-FKA-C3K23E1L3VG5ZB3Z3" SMD4_UHD111A-FKA_CRW 53.47,153.4 r90 top
LED24 "UHD111A-FKA-C3K23E1L3VG5ZB3Z3" SMD4_UHD111A-FKA_CRW 53.47,178.6 r90 top
LED25 "UHD111A-FKA-C3K23E1L3VG5ZB3Z3" SMD4_UHD111A-FKA_CRW 56.27,131 r90 top
LED26 "UHD111A-FKA-C3K23E1L3VG5ZB3Z3" SMD4_UHD111A-FKA_CRW 56.27,156.2 r90 top
LED27 "UHD111A-FKA-C3K23E1L3VG5ZB3Z3" SMD4_UHD111A-FKA_CRW 56.27,181.4 r90 top
LED28 "UHD111A-FKA-C3K23E1L3VG5ZB3Z3" SMD4_UHD111A-FKA_CRW 59.07,131 r90 top
LED29 "UHD111A-FKA-C3K23E1L3VG5ZB3Z3" SMD4_UHD111A-FKA_CRW 59.07,156.2 r90 top
LED30 "UHD111A-FKA-C3K23E1L3VG5ZB3Z3" SMD4_UHD111A-FKA_CRW 59.07,181.4 r90 top
LED31 "UHD111A-FKA-C3K23E1L3VG5ZB3Z3" SMD4_UHD111A-FKA_CRW 50.67,131 r90 top
LED32 "UHD111A-FKA-C3K23E1L3VG5ZB3Z3" SMD4_UHD111A-FKA_CRW 50.67,156.2 r90 top
LED33 "UHD111A-FKA-C3K23E1L3VG5ZB3Z3" SMD4_UHD111A-FKA_CRW 50.67,181.4 r90 top
LED34 "UHD111A-FKA-C3K23E1L3VG5ZB3Z3" SMD4_UHD111A-FKA_CRW 53.47,131 r90 top
LED35 "UHD111A-FKA-C3K23E1L3VG5ZB3Z3" SMD4_UHD111A-FKA_CRW 53.47,156.2 r90 top
LED36 "UHD111A-FKA-C3K23E1L3VG5ZB3Z3" SMD4_UHD111A-FKA_CRW 53.47,181.4 r90 top
LED37 "UHD111A-FKA-C3K23E1L3VG5ZB3Z3" SMD4_UHD111A-FKA_CRW 56.27,159 r90 top
LED38 "UHD111A-FKA-C3K23E1L3VG5ZB3Z3" SMD4_UHD111A-FKA_CRW 56.27,184.2 r90 top
LED39 "UHD111A-FKA-C3K23E1L3VG5ZB3Z3" SMD4_UHD111A-FKA_CRW 59.07,159 r90 top
LED40 "UHD111A-FKA-C3K23E1L3VG5ZB3Z3" SMD4_UHD111A-FKA_CRW 59.07,184.2 r90 top
LED41 "UHD111A-FKA-C3K23E1L3VG5ZB3Z3" SMD4_UHD111A-FKA_CRW 56.27,133.8 r90 top
LED42 "UHD111A-FKA-C3K23E1L3VG5ZB3Z3" SMD4_UHD111A-FKA_CRW 59.07,133.8 r90 top
LED43 "UHD111A-FKA-C3K23E1L3VG5ZB3Z3" SMD4_UHD111A-FKA_CRW 50.67,159 r90 top
LED44 "UHD111A-FKA-C3K23E1L3VG5ZB3Z3" SMD4_UHD111A-FKA_CRW 50.67,184.2 r90 top
LED45 "UHD111A-FKA-C3K23E1L3VG5ZB3Z3" SMD4_UHD111A-FKA_CRW 53.47,159 r90 top
LED46 "UHD111A-FKA-C3K23E1L3VG5ZB3Z3" SMD4_UHD111A-FKA_CRW 53.47,184.2 r90 top
LED47 "UHD111A-FKA-C3K23E1L3VG5ZB3Z3" SMD4_UHD111A-FKA_CRW 50.67,133.8 r90 top
LED48 "UHD111A-FKA-C3K23E1L3VG5ZB3Z3" SMD4_UHD111A-FKA_CRW 53.47,133.8 r90 top
LED49 "UHD111A-FKA-C3K23E1L3VG5ZB3Z3" SMD4_UHD111A-FKA_CRW 56.27,136.6 r90 top
LED50 "UHD111A-FKA-C3K23E1L3VG5ZB3Z3" SMD4_UHD111A-FKA_CRW 56.27,161.8 r90 top
LED51 "UHD111A-FKA-C3K23E1L3VG5ZB3Z3" SMD4_UHD111A-FKA_CRW 56.27,187 r90 top
LED52 "UHD111A-FKA-C3K23E1L3VG5ZB3Z3" SMD4_UHD111A-FKA_CRW 59.07,136.6 r90 top
LED53 "UHD111A-FKA-C3K23E1L3VG5ZB3Z3" SMD4_UHD111A-FKA_CRW 59.07,161.8 r90 top
LED54 "UHD111A-FKA-C3K23E1L3VG5ZB3Z3" SMD4_UHD111A-FKA_CRW 59.07,187 r90 top
LED55 "UHD111A-FKA-C3K23E1L3VG5ZB3Z3" SMD4_UHD111A-FKA_CRW 50.67,136.6 r90 top
LED56 "UHD111A-FKA-C3K23E1L3VG5ZB3Z3" SMD4_UHD111A-FKA_CRW 50.67,161.8 r90 top
LED57 "UHD111A-FKA-C3K23E1L3VG5ZB3Z3" SMD4_UHD111A-FKA_CRW 50.67,187 r90 top
LED58 "UHD111A-FKA-C3K23E1L3VG5ZB3Z3" SMD4_UHD111A-FKA_CRW 53.47,136.6 r90 top
LED59 "UHD111A-FKA-C3K23E1L3VG5ZB3Z3" SMD4_UHD111A-FKA_CRW 53.47,161.8 r90 top
LED60 "UHD111A-FKA-C3K23E1L3VG5ZB3Z3" SMD4_UHD111A-FKA_CRW 53.47,187 r90 top
LED61 "UHD111A-FKA-C3K23E1L3VG5ZB3Z3" SMD4_UHD111A-FKA_CRW 56.27,139.4 r90 top
LED62 "UHD111A-FKA-C3K23E1L3VG5ZB3Z3" SMD4_UHD111A-FKA_CRW 56.27,164.6 r90 top
LED63 "UHD111A-FKA-C3K23E1L3VG5ZB3Z3" SMD4_UHD111A-FKA_CRW 56.27,189.8 r90 top
LED64 "UHD111A-FKA-C3K23E1L3VG5ZB3Z3" SMD4_UHD111A-FKA_CRW 59.07,139.4 r90 top
LED65 "UHD111A-FKA-C3K23E1L3VG5ZB3Z3" SMD4_UHD111A-FKA_CRW 59.07,164.6 r90 top
LED66 "UHD111A-FKA-C3K23E1L3VG5ZB3Z3" SMD4_UHD111A-FKA_CRW 59.07,189.8 r90 top
LED67 "UHD111A-FKA-C3K23E1L3VG5ZB3Z3" SMD4_UHD111A-FKA_CRW 50.67,139.4 r90 top
LED68 "UHD111A-FKA-C3K23E1L3VG5ZB3Z3" SMD4_UHD111A-FKA_CRW 50.67,164.6 r90 top
LED69 "UHD111A-FKA-C3K23E1L3VG5ZB3Z3" SMD4_UHD111A-FKA_CRW 50.67,189.8 r90 top
LED70 "UHD111A-FKA-C3K23E1L3VG5ZB3Z3" SMD4_UHD111A-FKA_CRW 53.47,139.4 r90 top
LED71 "UHD111A-FKA-C3K23E1L3VG5ZB3Z3" SMD4_UHD111A-FKA_CRW 53.47,164.6 r90 top
LED72 "UHD111A-FKA-C3K23E1L3VG5ZB3Z3" SMD4_UHD111A-FKA_CRW 53.47,189.8 r90 top
LED73 "UHD111A-FKA-C3K23E1L3VG5ZB3Z3" SMD4_UHD111A-FKA_CRW 56.27,142.2 r90 top
LED74 "UHD111A-FKA-C3K23E1L3VG5ZB3Z3" SMD4_UHD111A-FKA_CRW 56.27,167.4 r90 top
LED75 "UHD111A-FKA-C3K23E1L3VG5ZB3Z3" SMD4_UHD111A-FKA_CRW 59.07,142.2 r90 top
LED76 "UHD111A-FKA-C3K23E1L3VG5ZB3Z3" SMD4_UHD111A-FKA_CRW 59.07,167.4 r90 top
LED77 "UHD111A-FKA-C3K23E1L3VG5ZB3Z3" SMD4_UHD111A-FKA_CRW 50.67,142.2 r90 top
LED78 "UHD111A-FKA-C3K23E1L3VG5ZB3Z3" SMD4_UHD111A-FKA_CRW 50.67,167.4 r90 top
LED79 "UHD111A-FKA-C3K23E1L3VG5ZB3Z3" SMD4_UHD111A-FKA_CRW 53.47,142.2 r90 top
LED80 "UHD111A-FKA-C3K23E1L3VG5ZB3Z3" SMD4_UHD111A-FKA_CRW 53.47,167.4 r90 top
LED81 "UHD111A-FKA-C3K23E1L3VG5ZB3Z3" SMD4_UHD111A-FKA_CRW 56.27,145 r90 top
LED82 "UHD111A-FKA-C3K23E1L3VG5ZB3Z3" SMD4_UHD111A-FKA_CRW 56.27,170.2 r90 top
LED83 "UHD111A-FKA-C3K23E1L3VG5ZB3Z3" SMD4_UHD111A-FKA_CRW 59.07,145 r90 top
LED84 "UHD111A-FKA-C3K23E1L3VG5ZB3Z3" SMD4_UHD111A-FKA_CRW 59.07,170.2 r90 top
LED85 "UHD111A-FKA-C3K23E1L3VG5ZB3Z3" SMD4_UHD111A-FKA_CRW 50.67,145 r90 top
LED86 "UHD111A-FKA-C3K23E1L3VG5ZB3Z3" SMD4_UHD111A-FKA_CRW 50.67,170.2 r90 top
LED87 "UHD111A-FKA-C3K23E1L3VG5ZB3Z3" SMD4_UHD111A-FKA_CRW 53.47,145 r90 top
LED88 "UHD111A-FKA-C3K23E1L3VG5ZB3Z3" SMD4_UHD111A-FKA_CRW 53.47,170.2 r90 top
LED89 "UHD111A-FKA-C3K23E1L3VG5ZB3Z3" SMD4_UHD111A-FKA_CRW 56.27,147.8 r90 top
LED90 "UHD111A-FKA-C3K23E1L3VG5ZB3Z3" SMD4_UHD111A-FKA_CRW 56.27,173 r90 top
LED91 "UHD111A-FKA-C3K23E1L3VG5ZB3Z3" SMD4_UHD111A-FKA_CRW 59.07,147.8 r90 top
LED92 "UHD111A-FKA-C3K23E1L3VG5ZB3Z3" SMD4_UHD111A-FKA_CRW 59.07,173 r90 top
LED93 "UHD111A-FKA-C3K23E1L3VG5ZB3Z3" SMD4_UHD111A-FKA_CRW 50.67,147.8 r90 top
LED94 "UHD111A-FKA-C3K23E1L3VG5ZB3Z3" SMD4_UHD111A-FKA_CRW 50.67,173 r90 top
LED95 "UHD111A-FKA-C3K23E1L3VG5ZB3Z3" SMD4_UHD111A-FKA_CRW 53.47,147.8 r90 top
LED96 "UHD111A-FKA-C3K23E1L3VG5ZB3Z3" SMD4_UHD111A-FKA_CRW 53.47,173 r90 top
LED97 "UHD111A-FKA-C3K23E1L3VG5ZB3Z3" SMD4_UHD111A-FKA_CRW 45.07,125.4 r90 top
LED98 "UHD111A-FKA-C3K23E1L3VG5ZB3Z3" SMD4_UHD111A-FKA_CRW 45.07,150.6 r90 top
LED99 "UHD111A-FKA-C3K23E1L3VG5ZB3Z3" SMD4_UHD111A-FKA_CRW 45.07,175.8 r90 top
LED100 "UHD111A-FKA-C3K23E1L3VG5ZB3Z3" SMD4_UHD111A-FKA_CRW 47.87,125.4 r90 top
LED101 "UHD111A-FKA-C3K23E1L3VG5ZB3Z3" SMD4_UHD111A-FKA_CRW 47.87,150.6 r90 top
LED102 "UHD111A-FKA-C3K23E1L3VG5ZB3Z3" SMD4_UHD111A-FKA_CRW 47.87,175.8 r90 top
LED103 "UHD111A-FKA-C3K23E1L3VG5ZB3Z3" SMD4_UHD111A-FKA_CRW 39.47,125.4 r90 top
LED104 "UHD111A-FKA-C3K23E1L3VG5ZB3Z3" SMD4_UHD111A-FKA_CRW 39.47,150.6 r90 top
LED105 "UHD111A-FKA-C3K23E1L3VG5ZB3Z3" SMD4_UHD111A-FKA_CRW 39.47,175.8 r90 top
LED106 "UHD111A-FKA-C3K23E1L3VG5ZB3Z3" SMD4_UHD111A-FKA_CRW 42.27,125.4 r90 top
LED107 "UHD111A-FKA-C3K23E1L3VG5ZB3Z3" SMD4_UHD111A-FKA_CRW 42.27,150.6 r90 top
LED108 "UHD111A-FKA-C3K23E1L3VG5ZB3Z3" SMD4_UHD111A-FKA_CRW 42.27,175.8 r90 top
LED109 "UHD111A-FKA-C3K23E1L3VG5ZB3Z3" SMD4_UHD111A-FKA_CRW 45.07,128.2 r90 top
LED110 "UHD111A-FKA-C3K23E1L3VG5ZB3Z3" SMD4_UHD111A-FKA_CRW 45.07,153.4 r90 top
LED111 "UHD111A-FKA-C3K23E1L3VG5ZB3Z3" SMD4_UHD111A-FKA_CRW 45.07,178.6 r90 top
LED112 "UHD111A-FKA-C3K23E1L3VG5ZB3Z3" SMD4_UHD111A-FKA_CRW 47.87,128.2 r90 top
LED113 "UHD111A-FKA-C3K23E1L3VG5ZB3Z3" SMD4_UHD111A-FKA_CRW 47.87,153.4 r90 top
LED114 "UHD111A-FKA-C3K23E1L3VG5ZB3Z3" SMD4_UHD111A-FKA_CRW 47.87,178.6 r90 top
LED115 "UHD111A-FKA-C3K23E1L3VG5ZB3Z3" SMD4_UHD111A-FKA_CRW 39.47,128.2 r90 top
LED116 "UHD111A-FKA-C3K23E1L3VG5ZB3Z3" SMD4_UHD111A-FKA_CRW 39.47,153.4 r90 top
LED117 "UHD111A-FKA-C3K23E1L3VG5ZB3Z3" SMD4_UHD111A-FKA_CRW 39.47,178.6 r90 top
LED118 "UHD111A-FKA-C3K23E1L3VG5ZB3Z3" SMD4_UHD111A-FKA_CRW 42.27,128.2 r90 top
LED119 "UHD111A-FKA-C3K23E1L3VG5ZB3Z3" SMD4_UHD111A-FKA_CRW 42.27,153.4 r90 top
LED120 "UHD111A-FKA-C3K23E1L3VG5ZB3Z3" SMD4_UHD111A-FKA_CRW 42.27,178.6 r90 top
LED121 "UHD111A-FKA-C3K23E1L3VG5ZB3Z3" SMD4_UHD111A-FKA_CRW 45.07,131 r90 top
LED122 "UHD111A-FKA-C3K23E1L3VG5ZB3Z3" SMD4_UHD111A-FKA_CRW 45.07,156.2 r90 top
LED123 "UHD111A-FKA-C3K23E1L3VG5ZB3Z3" SMD4_UHD111A-FKA_CRW 45.07,181.4 r90 top
LED124 "UHD111A-FKA-C3K23E1L3VG5ZB3Z3" SMD4_UHD111A-FKA_CRW 47.87,131 r90 top
LED125 "UHD111A-FKA-C3K23E1L3VG5ZB3Z3" SMD4_UHD111A-FKA_CRW 47.87,156.2 r90 top
LED126 "UHD111A-FKA-C3K23E1L3VG5ZB3Z3" SMD4_UHD111A-FKA_CRW 47.87,181.4 r90 top
LED127 "UHD111A-FKA-C3K23E1L3VG5ZB3Z3" SMD4_UHD111A-FKA_CRW 39.47,131 r90 top
LED128 "UHD111A-FKA-C3K23E1L3VG5ZB3Z3" SMD4_UHD111A-FKA_CRW 39.47,156.2 r90 top
LED129 "UHD111A-FKA-C3K23E1L3VG5ZB3Z3" SMD4_UHD111A-FKA_CRW 39.47,181.4 r90 top
LED130 "UHD111A-FKA-C3K23E1L3VG5ZB3Z3" SMD4_UHD111A-FKA_CRW 42.27,131 r90 top
LED131 "UHD111A-FKA-C3K23E1L3VG5ZB3Z3" SMD4_UHD111A-FKA_CRW 42.27,156.2 r90 top
LED132 "UHD111A-FKA-C3K23E1L3VG5ZB3Z3" SMD4_UHD111A-FKA_CRW 42.27,181.4 r90 top
LED133 "UHD111A-FKA-C3K23E1L3VG5ZB3Z3" SMD4_UHD111A-FKA_CRW 45.07,159 r90 top
LED134 "UHD111A-FKA-C3K23E1L3VG5ZB3Z3" SMD4_UHD111A-FKA_CRW 45.07,184.2 r90 top
LED135 "UHD111A-FKA-C3K23E1L3VG5ZB3Z3" SMD4_UHD111A-FKA_CRW 47.87,159 r90 top
LED136 "UHD111A-FKA-C3K23E1L3VG5ZB3Z3" SMD4_UHD111A-FKA_CRW 47.87,184.2 r90 top
LED137 "UHD111A-FKA-C3K23E1L3VG5ZB3Z3" SMD4_UHD111A-FKA_CRW 45.07,133.8 r90 top
LED138 "UHD111A-FKA-C3K23E1L3VG5ZB3Z3" SMD4_UHD111A-FKA_CRW 47.87,133.8 r90 top
LED139 "UHD111A-FKA-C3K23E1L3VG5ZB3Z3" SMD4_UHD111A-FKA_CRW 39.47,159 r90 top
LED140 "UHD111A-FKA-C3K23E1L3VG5ZB3Z3" SMD4_UHD111A-FKA_CRW 39.47,184.2 r90 top
LED141 "UHD111A-FKA-C3K23E1L3VG5ZB3Z3" SMD4_UHD111A-FKA_CRW 42.27,159 r90 top
LED142 "UHD111A-FKA-C3K23E1L3VG5ZB3Z3" SMD4_UHD111A-FKA_CRW 42.27,184.2 r90 top
LED143 "UHD111A-FKA-C3K23E1L3VG5ZB3Z3" SMD4_UHD111A-FKA_CRW 39.47,133.8 r90 top
LED144 "UHD111A-FKA-C3K23E1L3VG5ZB3Z3" SMD4_UHD111A-FKA_CRW 42.27,133.8 r90 top
LED145 "UHD111A-FKA-C3K23E1L3VG5ZB3Z3" SMD4_UHD111A-FKA_CRW 45.07,136.6 r90 top
LED146 "UHD111A-FKA-C3K23E1L3VG5ZB3Z3" SMD4_UHD111A-FKA_CRW 45.07,161.8 r90 top
LED147 "UHD111A-FKA-C3K23E1L3VG5ZB3Z3" SMD4_UHD111A-FKA_CRW 45.07,187 r90 top
LED148 "UHD111A-FKA-C3K23E1L3VG5ZB3Z3" SMD4_UHD111A-FKA_CRW 47.87,136.6 r90 top
LED149 "UHD111A-FKA-C3K23E1L3VG5ZB3Z3" SMD4_UHD111A-FKA_CRW 47.87,161.8 r90 top
LED150 "UHD111A-FKA-C3K23E1L3VG5ZB3Z3" SMD4_UHD111A-FKA_CRW 47.87,187 r90 top
LED151 "UHD111A-FKA-C3K23E1L3VG5ZB3Z3" SMD4_UHD111A-FKA_CRW 39.47,136.6 r90 top
LED152 "UHD111A-FKA-C3K23E1L3VG5ZB3Z3" SMD4_UHD111A-FKA_CRW 39.47,161.8 r90 top
LED153 "UHD111A-FKA-C3K23E1L3VG5ZB3Z3" SMD4_UHD111A-FKA_CRW 39.47,187 r90 top
LED154 "UHD111A-FKA-C3K23E1L3VG5ZB3Z3" SMD4_UHD111A-FKA_CRW 42.27,136.6 r90 top
LED155 "UHD111A-FKA-C3K23E1L3VG5ZB3Z3" SMD4_UHD111A-FKA_CRW 42.27,161.8 r90 top
LED156 "UHD111A-FKA-C3K23E1L3VG5ZB3Z3" SMD4_UHD111A-FKA_CRW 42.27,187 r90 top
LED157 "UHD111A-FKA-C3K23E1L3VG5ZB3Z3" SMD4_UHD111A-FKA_CRW 45.07,139.4 r90 top
LED158 "UHD111A-FKA-C3K23E1L3VG5ZB3Z3" SMD4_UHD111A-FKA_CRW 45.07,164.6 r90 top
LED159 "UHD111A-FKA-C3K23E1L3VG5ZB3Z3" SMD4_UHD111A-FKA_CRW 45.07,189.8 r90 top
LED160 "UHD111A-FKA-C3K23E1L3VG5ZB3Z3" SMD4_UHD111A-FKA_CRW 47.87,139.4 r90 top
LED161 "UHD111A-FKA-C3K23E1L3VG5ZB3Z3" SMD4_UHD111A-FKA_CRW 47.87,164.6 r90 top
LED162 "UHD111A-FKA-C3K23E1L3VG5ZB3Z3" SMD4_UHD111A-FKA_CRW 47.87,189.8 r90 top
LED163 "UHD111A-FKA-C3K23E1L3VG5ZB3Z3" SMD4_UHD111A-FKA_CRW 39.47,139.4 r90 top
LED164 "UHD111A-FKA-C3K23E1L3VG5ZB3Z3" SMD4_UHD111A-FKA_CRW 39.47,164.6 r90 top
LED165 "UHD111A-FKA-C3K23E1L3VG5ZB3Z3" SMD4_UHD111A-FKA_CRW 39.47,189.8 r90 top
LED166 "UHD111A-FKA-C3K23E1L3VG5ZB3Z3" SMD4_UHD111A-FKA_CRW 42.27,139.4 r90 top
LED167 "UHD111A-FKA-C3K23E1L3VG5ZB3Z3" SMD4_UHD111A-FKA_CRW 42.27,164.6 r90 top
LED168 "UHD111A-FKA-C3K23E1L3VG5ZB3Z3" SMD4_UHD111A-FKA_CRW 42.27,189.8 r90 top
LED169 "UHD111A-FKA-C3K23E1L3VG5ZB3Z3" SMD4_UHD111A-FKA_CRW 45.07,142.2 r90 top
LED170 "UHD111A-FKA-C3K23E1L3VG5ZB3Z3" SMD4_UHD111A-FKA_CRW 45.07,167.4 r90 top
LED171 "UHD111A-FKA-C3K23E1L3VG5ZB3Z3" SMD4_UHD111A-FKA_CRW 47.87,142.2 r90 top
LED172 "UHD111A-FKA-C3K23E1L3VG5ZB3Z3" SMD4_UHD111A-FKA_CRW 47.87,167.4 r90 top
LED173 "UHD111A-FKA-C3K23E1L3VG5ZB3Z3" SMD4_UHD111A-FKA_CRW 39.47,142.2 r90 top
LED174 "UHD111A-FKA-C3K23E1L3VG5ZB3Z3" SMD4_UHD111A-FKA_CRW 39.47,167.4 r90 top
LED175 "UHD111A-FKA-C3K23E1L3VG5ZB3Z3" SMD4_UHD111A-FKA_CRW 42.27,142.2 r90 top
LED176 "UHD111A-FKA-C3K23E1L3VG5ZB3Z3" SMD4_UHD111A-FKA_CRW 42.27,167.4 r90 top
LED177 "UHD111A-FKA-C3K23E1L3VG5ZB3Z3" SMD4_UHD111A-FKA_CRW 45.07,145 r90 top
LED178 "UHD111A-FKA-C3K23E1L3VG5ZB3Z3" SMD4_UHD111A-FKA_CRW 45.07,170.2 r90 top
LED179 "UHD111A-FKA-C3K23E1L3VG5ZB3Z3" SMD4_UHD111A-FKA_CRW 47.87,145 r90 top
LED180 "UHD111A-FKA-C3K23E1L3VG5ZB3Z3" SMD4_UHD111A-FKA_CRW 47.87,170.2 r90 top
LED181 "UHD111A-FKA-C3K23E1L3VG5ZB3Z3" SMD4_UHD111A-FKA_CRW 39.47,145 r90 top
LED182 "UHD111A-FKA-C3K23E1L3VG5ZB3Z3" SMD4_UHD111A-FKA_CRW 39.47,170.2 r90 top
LED183 "UHD111A-FKA-C3K23E1L3VG5ZB3Z3" SMD4_UHD111A-FKA_CRW 42.27,145 r90 top
LED184 "UHD111A-FKA-C3K23E1L3VG5ZB3Z3" SMD4_UHD111A-FKA_CRW 42.27,170.2 r90 top
LED185 "UHD111A-FKA-C3K23E1L3VG5ZB3Z3" SMD4_UHD111A-FKA_CRW 45.07,147.8 r90 top
LED186 "UHD111A-FKA-C3K23E1L3VG5ZB3Z3" SMD4_UHD111A-FKA_CRW 45.07,173 r90 top
LED187 "UHD111A-FKA-C3K23E1L3VG5ZB3Z3" SMD4_UHD111A-FKA_CRW 47.87,147.8 r90 top
LED188 "UHD111A-FKA-C3K23E1L3VG5ZB3Z3" SMD4_UHD111A-FKA_CRW 47.87,173 r90 top
LED189 "UHD111A-FKA-C3K23E1L3VG5ZB3Z3" SMD4_UHD111A-FKA_CRW 39.47,147.8 r90 top
LED190 "UHD111A-FKA-C3K23E1L3VG5ZB3Z3" SMD4_UHD111A-FKA_CRW 39.47,173 r90 top
LED191 "UHD111A-FKA-C3K23E1L3VG5ZB3Z3" SMD4_UHD111A-FKA_CRW 42.27,147.8 r90 top
LED192 "UHD111A-FKA-C3K23E1L3VG5ZB3Z3" SMD4_UHD111A-FKA_CRW 42.27,173 r90 top
LED193 "UHD111A-FKA-C3K23E1L3VG5ZB3Z3" SMD4_UHD111A-FKA_CRW 33.87,125.4 r90 top
LED194 "UHD111A-FKA-C3K23E1L3VG5ZB3Z3" SMD4_UHD111A-FKA_CRW 33.87,150.6 r90 top
LED195 "UHD111A-FKA-C3K23E1L3VG5ZB3Z3" SMD4_UHD111A-FKA_CRW 33.87,175.8 r90 top
LED196 "UHD111A-FKA-C3K23E1L3VG5ZB3Z3" SMD4_UHD111A-FKA_CRW 36.67,125.4 r90 top
LED197 "UHD111A-FKA-C3K23E1L3VG5ZB3Z3" SMD4_UHD111A-FKA_CRW 36.67,150.6 r90 top
LED198 "UHD111A-FKA-C3K23E1L3VG5ZB3Z3" SMD4_UHD111A-FKA_CRW 36.67,175.8 r90 top
LED199 "UHD111A-FKA-C3K23E1L3VG5ZB3Z3" SMD4_UHD111A-FKA_CRW 28.27,125.4 r90 top
LED200 "UHD111A-FKA-C3K23E1L3VG5ZB3Z3" SMD4_UHD111A-FKA_CRW 28.27,150.6 r90 top
LED201 "UHD111A-FKA-C3K23E1L3VG5ZB3Z3" SMD4_UHD111A-FKA_CRW 28.27,175.8 r90 top
LED202 "UHD111A-FKA-C3K23E1L3VG5ZB3Z3" SMD4_UHD111A-FKA_CRW 31.07,125.4 r90 top
LED203 "UHD111A-FKA-C3K23E1L3VG5ZB3Z3" SMD4_UHD111A-FKA_CRW 31.07,150.6 r90 top
LED204 "UHD111A-FKA-C3K23E1L3VG5ZB3Z3" SMD4_UHD111A-FKA_CRW 31.07,175.8 r90 top
LED205 "UHD111A-FKA-C3K23E1L3VG5ZB3Z3" SMD4_UHD111A-FKA_CRW 33.87,128.2 r90 top
LED206 "UHD111A-FKA-C3K23E1L3VG5ZB3Z3" SMD4_UHD111A-FKA_CRW 33.87,153.4 r90 top
LED207 "UHD111A-FKA-C3K23E1L3VG5ZB3Z3" SMD4_UHD111A-FKA_CRW 33.87,178.6 r90 top
LED208 "UHD111A-FKA-C3K23E1L3VG5ZB3Z3" SMD4_UHD111A-FKA_CRW 36.67,128.2 r90 top
LED209 "UHD111A-FKA-C3K23E1L3VG5ZB3Z3" SMD4_UHD111A-FKA_CRW 36.67,153.4 r90 top
LED210 "UHD111A-FKA-C3K23E1L3VG5ZB3Z3" SMD4_UHD111A-FKA_CRW 36.67,178.6 r90 top
LED211 "UHD111A-FKA-C3K23E1L3VG5ZB3Z3" SMD4_UHD111A-FKA_CRW 28.27,128.2 r90 top
LED212 "UHD111A-FKA-C3K23E1L3VG5ZB3Z3" SMD4_UHD111A-FKA_CRW 28.27,153.4 r90 top
LED213 "UHD111A-FKA-C3K23E1L3VG5ZB3Z3" SMD4_UHD111A-FKA_CRW 28.27,178.6 r90 top
LED214 "UHD111A-FKA-C3K23E1L3VG5ZB3Z3" SMD4_UHD111A-FKA_CRW 31.07,128.2 r90 top
LED215 "UHD111A-FKA-C3K23E1L3VG5ZB3Z3" SMD4_UHD111A-FKA_CRW 31.07,153.4 r90 top
LED216 "UHD111A-FKA-C3K23E1L3VG5ZB3Z3" SMD4_UHD111A-FKA_CRW 31.07,178.6 r90 top
LED217 "UHD111A-FKA-C3K23E1L3VG5ZB3Z3" SMD4_UHD111A-FKA_CRW 33.87,131 r90 top
LED218 "UHD111A-FKA-C3K23E1L3VG5ZB3Z3" SMD4_UHD111A-FKA_CRW 33.87,156.2 r90 top
LED219 "UHD111A-FKA-C3K23E1L3VG5ZB3Z3" SMD4_UHD111A-FKA_CRW 33.87,181.4 r90 top
LED220 "UHD111A-FKA-C3K23E1L3VG5ZB3Z3" SMD4_UHD111A-FKA_CRW 36.67,131 r90 top
LED221 "UHD111A-FKA-C3K23E1L3VG5ZB3Z3" SMD4_UHD111A-FKA_CRW 36.67,156.2 r90 top
LED222 "UHD111A-FKA-C3K23E1L3VG5ZB3Z3" SMD4_UHD111A-FKA_CRW 36.67,181.4 r90 top
LED223 "UHD111A-FKA-C3K23E1L3VG5ZB3Z3" SMD4_UHD111A-FKA_CRW 28.27,131 r90 top
LED224 "UHD111A-FKA-C3K23E1L3VG5ZB3Z3" SMD4_UHD111A-FKA_CRW 28.27,156.2 r90 top
LED225 "UHD111A-FKA-C3K23E1L3VG5ZB3Z3" SMD4_UHD111A-FKA_CRW 28.27,181.4 r90 top
LED226 "UHD111A-FKA-C3K23E1L3VG5ZB3Z3" SMD4_UHD111A-FKA_CRW 31.07,131 r90 top
LED227 "UHD111A-FKA-C3K23E1L3VG5ZB3Z3" SMD4_UHD111A-FKA_CRW 31.07,156.2 r90 top
LED228 "UHD111A-FKA-C3K23E1L3VG5ZB3Z3" SMD4_UHD111A-FKA_CRW 31.07,181.4 r90 top
LED229 "UHD111A-FKA-C3K23E1L3VG5ZB3Z3" SMD4_UHD111A-FKA_CRW 33.87,159 r90 top
LED230 "UHD111A-FKA-C3K23E1L3VG5ZB3Z3" SMD4_UHD111A-FKA_CRW 33.87,184.2 r90 top
LED231 "UHD111A-FKA-C3K23E1L3VG5ZB3Z3" SMD4_UHD111A-FKA_CRW 36.67,159 r90 top
LED232 "UHD111A-FKA-C3K23E1L3VG5ZB3Z3" SMD4_UHD111A-FKA_CRW 36.67,184.2 r90 top
LED233 "UHD111A-FKA-C3K23E1L3VG5ZB3Z3" SMD4_UHD111A-FKA_CRW 28.27,159 r90 top
LED234 "UHD111A-FKA-C3K23E1L3VG5ZB3Z3" SMD4_UHD111A-FKA_CRW 28.27,184.2 r90 top
LED235 "UHD111A-FKA-C3K23E1L3VG5ZB3Z3" SMD4_UHD111A-FKA_CRW 31.07,159 r90 top
LED236 "UHD111A-FKA-C3K23E1L3VG5ZB3Z3" SMD4_UHD111A-FKA_CRW 31.07,184.2 r90 top
LED237 "UHD111A-FKA-C3K23E1L3VG5ZB3Z3" SMD4_UHD111A-FKA_CRW 33.87,133.8 r90 top
LED238 "UHD111A-FKA-C3K23E1L3VG5ZB3Z3" SMD4_UHD111A-FKA_CRW 36.67,133.8 r90 top
LED239 "UHD111A-FKA-C3K23E1L3VG5ZB3Z3" SMD4_UHD111A-FKA_CRW 28.27,133.8 r90 top
LED240 "UHD111A-FKA-C3K23E1L3VG5ZB3Z3" SMD4_UHD111A-FKA_CRW 31.07,133.8 r90 top
LED241 "UHD111A-FKA-C3K23E1L3VG5ZB3Z3" SMD4_UHD111A-FKA_CRW 33.87,136.6 r90 top
LED242 "UHD111A-FKA-C3K23E1L3VG5ZB3Z3" SMD4_UHD111A-FKA_CRW 33.87,161.8 r90 top
LED243 "UHD111A-FKA-C3K23E1L3VG5ZB3Z3" SMD4_UHD111A-FKA_CRW 33.87,187 r90 top
LED244 "UHD111A-FKA-C3K23E1L3VG5ZB3Z3" SMD4_UHD111A-FKA_CRW 36.67,136.6 r90 top
LED245 "UHD111A-FKA-C3K23E1L3VG5ZB3Z3" SMD4_UHD111A-FKA_CRW 36.67,161.8 r90 top
LED246 "UHD111A-FKA-C3K23E1L3VG5ZB3Z3" SMD4_UHD111A-FKA_CRW 36.67,187 r90 top
LED247 "UHD111A-FKA-C3K23E1L3VG5ZB3Z3" SMD4_UHD111A-FKA_CRW 28.27,136.6 r90 top
LED248 "UHD111A-FKA-C3K23E1L3VG5ZB3Z3" SMD4_UHD111A-FKA_CRW 28.27,161.8 r90 top
LED249 "UHD111A-FKA-C3K23E1L3VG5ZB3Z3" SMD4_UHD111A-FKA_CRW 28.27,187 r90 top
LED250 "UHD111A-FKA-C3K23E1L3VG5ZB3Z3" SMD4_UHD111A-FKA_CRW 31.07,136.6 r90 top
LED251 "UHD111A-FKA-C3K23E1L3VG5ZB3Z3" SMD4_UHD111A-FKA_CRW 31.07,161.8 r90 top
LED252 "UHD111A-FKA-C3K23E1L3VG5ZB3Z3" SMD4_UHD111A-FKA_CRW 31.07,187 r90 top
LED253 "UHD111A-FKA-C3K23E1L3VG5ZB3Z3" SMD4_UHD111A-FKA_CRW 33.87,139.4 r90 top
LED254 "UHD111A-FKA-C3K23E1L3VG5ZB3Z3" SMD4_UHD111A-FKA_CRW 33.87,164.6 r90 top
LED255 "UHD111A-FKA-C3K23E1L3VG5ZB3Z3" SMD4_UHD111A-FKA_CRW 33.87,189.8 r90 top
LED256 "UHD111A-FKA-C3K23E1L3VG5ZB3Z3" SMD4_UHD111A-FKA_CRW 36.67,139.4 r90 top
LED257 "UHD111A-FKA-C3K23E1L3VG5ZB3Z3" SMD4_UHD111A-FKA_CRW 36.67,164.6 r90 top
LED258 "UHD111A-FKA-C3K23E1L3VG5ZB3Z3" SMD4_UHD111A-FKA_CRW 36.67,189.8 r90 top
LED259 "UHD111A-FKA-C3K23E1L3VG5ZB3Z3" SMD4_UHD111A-FKA_CRW 28.27,139.4 r90 top
LED260 "UHD111A-FKA-C3K23E1L3VG5ZB3Z3" SMD4_UHD111A-FKA_CRW 28.27,164.6 r90 top
LED261 "UHD111A-FKA-C3K23E1L3VG5ZB3Z3" SMD4_UHD111A-FKA_CRW 28.27,189.8 r90 top
LED262 "UHD111A-FKA-C3K23E1L3VG5ZB3Z3" SMD4_UHD111A-FKA_CRW 31.07,139.4 r90 top
LED263 "UHD111A-FKA-C3K23E1L3VG5ZB3Z3" SMD4_UHD111A-FKA_CRW 31.07,164.6 r90 top
LED264 "UHD111A-FKA-C3K23E1L3VG5ZB3Z3" SMD4_UHD111A-FKA_CRW 31.07,189.8 r90 top
LED265 "UHD111A-FKA-C3K23E1L3VG5ZB3Z3" SMD4_UHD111A-FKA_CRW 33.87,142.2 r90 top
LED266 "UHD111A-FKA-C3K23E1L3VG5ZB3Z3" SMD4_UHD111A-FKA_CRW 33.87,167.4 r90 top
LED267 "UHD111A-FKA-C3K23E1L3VG5ZB3Z3" SMD4_UHD111A-FKA_CRW 36.67,142.2 r90 top
LED268 "UHD111A-FKA-C3K23E1L3VG5ZB3Z3" SMD4_UHD111A-FKA_CRW 36.67,167.4 r90 top
LED269 "UHD111A-FKA-C3K23E1L3VG5ZB3Z3" SMD4_UHD111A-FKA_CRW 28.27,142.2 r90 top
LED270 "UHD111A-FKA-C3K23E1L3VG5ZB3Z3" SMD4_UHD111A-FKA_CRW 28.27,167.4 r90 top
LED271 "UHD111A-FKA-C3K23E1L3VG5ZB3Z3" SMD4_UHD111A-FKA_CRW 31.07,142.2 r90 top
LED272 "UHD111A-FKA-C3K23E1L3VG5ZB3Z3" SMD4_UHD111A-FKA_CRW 31.07,167.4 r90 top
LED273 "UHD111A-FKA-C3K23E1L3VG5ZB3Z3" SMD4_UHD111A-FKA_CRW 33.87,145 r90 top
LED274 "UHD111A-FKA-C3K23E1L3VG5ZB3Z3" SMD4_UHD111A-FKA_CRW 33.87,170.2 r90 top
LED275 "UHD111A-FKA-C3K23E1L3VG5ZB3Z3" SMD4_UHD111A-FKA_CRW 36.67,145 r90 top
LED276 "UHD111A-FKA-C3K23E1L3VG5ZB3Z3" SMD4_UHD111A-FKA_CRW 36.67,170.2 r90 top
LED277 "UHD111A-FKA-C3K23E1L3VG5ZB3Z3" SMD4_UHD111A-FKA_CRW 28.27,145 r90 top
LED278 "UHD111A-FKA-C3K23E1L3VG5ZB3Z3" SMD4_UHD111A-FKA_CRW 28.27,170.2 r90 top
LED279 "UHD111A-FKA-C3K23E1L3VG5ZB3Z3" SMD4_UHD111A-FKA_CRW 31.07,145 r90 top
LED280 "UHD111A-FKA-C3K23E1L3VG5ZB3Z3" SMD4_UHD111A-FKA_CRW 31.07,170.2 r90 top
LED281 "UHD111A-FKA-C3K23E1L3VG5ZB3Z3" SMD4_UHD111A-FKA_CRW 33.87,147.8 r90 top
LED282 "UHD111A-FKA-C3K23E1L3VG5ZB3Z3" SMD4_UHD111A-FKA_CRW 33.87,173 r90 top
LED283 "UHD111A-FKA-C3K23E1L3VG5ZB3Z3" SMD4_UHD111A-FKA_CRW 36.67,147.8 r90 top
LED284 "UHD111A-FKA-C3K23E1L3VG5ZB3Z3" SMD4_UHD111A-FKA_CRW 36.67,173 r90 top
LED285 "UHD111A-FKA-C3K23E1L3VG5ZB3Z3" SMD4_UHD111A-FKA_CRW 28.27,147.8 r90 top
LED286 "UHD111A-FKA-C3K23E1L3VG5ZB3Z3" SMD4_UHD111A-FKA_CRW 28.27,173 r90 top
LED287 "UHD111A-FKA-C3K23E1L3VG5ZB3Z3" SMD4_UHD111A-FKA_CRW 31.07,147.8 r90 top
LED288 "UHD111A-FKA-C3K23E1L3VG5ZB3Z3" SMD4_UHD111A-FKA_CRW 31.07,173 r90 top
Q1 "2N7002K" SOT95P240X120-3N 81.28,147.193 r180 top
Q2 "2N7002K" SOT95P240X120-3N 128.969,169.227 r180 top
R1 "1.5k" RESC2012X60N 50.378,68.986 r0 top
R2 "1.5k" RESC2012X60N 50.378,66.954 r0 top
R3 "10k" RESC2012X60N 34.748,65.2 r0 top
R4 "3.1k" RESC2012X60N 36.017,70.399 r270 top
R5 "2.49k" RESC2012X60N 32.106,65.923 r90 top
R6 "732k" FP-AC0402-MFG 43.942,79.088 r90 top
R8 "100k" FP-AC0402-MFG 42.545,79.096 r270 top
R9 "178k" FP-AC0402-MFG 100.203,166.251 r270 top
R10 "732k" FP-AC0402-MFG 104.644,161.223 r0 top
R11 "169k" FP-AC0402-MFG 96.393,159.774 r90 top
R12 "80.6k" FP-AC0402-MFG 97.409,159.774 r90 top
R13 "80.6k" FP-AC0402-MFG 100.584,159.774 r90 top
R14 "32.4k" FP-AC0402-MFG 99.568,159.774 r90 top
R15 "10k" FP-AC0603-MFG 111.887,151.257 r90 top
R16 "10k" FP-AC0603-MFG 109.728,151.13 r90 top
R17 "10k" FP-AC0603-MFG 110.998,146.431 r270 top
R18 "100k" FP-AC0603-MFG 25.947,110.288 r180 top
R19 "100k" FP-AC0603-MFG 44.704,110.415 r180 top
R20 "100k" FP-AC0603-MFG 28.956,110.288 r180 top
R21 "100k" FP-AC0603-MFG 47.713,110.415 r180 top
R22 "22.0k" FP-AC0603-MFG 63.754,100.203 r270 bottom
R23 "22.0k" FP-AC0603-MFG 33.528,106.807 r90 top
R24 "100k" FP-AC0603-MFG 32.131,110.288 r180 top
R25 "100k" FP-AC0603-MFG 50.927,110.415 r180 top
R26 "100k" FP-AC0603-MFG 35.179,110.288 r180 top
R27 "100k" FP-AC0603-MFG 53.848,110.415 r180 top
R28 "100k" FP-AC0603-MFG 38.481,110.415 r180 top
R29 "100k" FP-AC0603-MFG 56.896,110.415 r180 top
R30 "100k" FP-AC0603-MFG 41.529,110.363 r180 top
R31 "100k" FP-AC0603-MFG 59.778,110.415 r180 top
R32 "100k" FP-AC0603-MFG 44.069,115.189 r90 bottom
R33 "10k" FP-AC0603-MFG 37.465,114.935 r270 bottom
R34 "10k" FP-AC0603-MFG 38.862,114.935 r270 bottom
R35 "10k" FP-AC0603-MFG 40.132,114.974 r270 bottom
R36 "10k" FP-AC0603-MFG 41.402,115.062 r270 bottom
R37 "10k" FP-AC0603-MFG 42.672,115.189 r270 bottom
R38 "10k" FP-AC0603-MFG 90.551,143.002 r180 top
R39 "10k" FP-AC0603-MFG 84.621,137.414 r180 top
R40 "100" FP-AC0603-MFG 80.811,137.414 r180 top
R41 "100k" FP-AC0603-MFG 89.408,149.733 r0 top
R42 "100" FP-AC0603-MFG 84.797,147.574 r180 top
R43 "1M" FP-AC0603-MFG 89.408,151.13 r0 top
R44 "100k" FP-AC0603-MFG 87.757,147.066 r90 top
R45 "100k" FP-AC0603-MFG 84.797,146.177 r180 top
R46 "4.7k" FP-AC0603-MFG 93.345,150.241 r90 top
R47 "4.7k" FP-AC0603-MFG 97.409,149.987 r90 top
R48 "0" FP-AC0603-MFG 95.885,150.964 r90 top
R49 "0" FP-AC0603-MFG 94.742,151.003 r270 top
R50 "5.1k" FP-AC0603-MFG 28.27,69.596 r180 top
R51 "5.1k" FP-AC0603-MFG 28.292,67.718 r0 top
R53 "100" FP-AC0603-MFG 94.869,95.504 r270 top
R54 "10k" FP-AC0603-MFG 127.787,173.291 r180 top
R55 "100" FP-AC0603-MFG 127.825,177.571 r270 top
R56 "100K" FP-AC0603-MFG 128.714,174.942 r180 top value=100k
R57 "10k" FP-AC0603-MFG 121.73,180.911 r270 top
R58 "10k" FP-AC0603-MFG 123.126,180.911 r270 top
R59 "3.3k" FP-AC0603-MFG 125.285,177.101 r180 top
R60 "3.3k" FP-AC0603-MFG 125.412,178.625 r180 top
R61 "5.1k" FP-AC0603-MFG 117.538,180.911 r90 top
R62 "5.1k" FP-AC0603-MFG 125.247,175.577 r0 top
R63 "100" FP-AC0603-MFG 119.189,180.911 r270 top
R64 "100K" FP-AC0603-MFG 120.459,180.911 r270 top
R_ANT_EXT1 "0" FP-AC0402-MFG 97.587,135.763 r180 top
R_ANT_PCB1 "0" FP-AC0402-MFG 97.587,134.493 r180 top
SW1 "PTS636SL43SMTRLFS" SW_PTS636S-J_CNK 104.954,149.225 r0 top
TP1 "Test Point" TP+245X165 32.639,97.155 r0 top
TP2 "Test Point" TP+245X165 34.163,103.378 r180 top
TP3 "Test Point" TP+245X165 29.718,97.155 r0 top
TP5 "Test Point" TP+245X165 125.73,139.573 r0 top
TP6 "Test Point" TP+245X165 117.856,144.399 r90 top
TP7 "Test Point" TP+245X165 114.554,151.003 r90 top
TP8 "Test Point" TP+245X165 125.73,141.986 r0 top
TP9 "Test Point" TP+245X165 125.857,149.733 r0 top
TP10 "Test Point" TP+245X165 125.73,146.558 r180 top
TP11 "Test Point" TP+245X165 35.433,97.155 r180 top
TP12 "Test Point" TP+245X165 38.481,97.155 r180 top
TP13 "Test Point" TP+245X165 41.529,104.394 r180 top
TP14 "Test Point" TP+245X165 25.4,121.285 r90 top
TP15 "Test Point" TP+245X165 47.883,104.406 r180 top
TP16 "Test Point" TP+245X165 41.275,97.155 r180 top
TP17 "Test Point" TP+245X165 47.244,99.441 r180 top
TP18 "Test Point" TP+245X165 38.735,104.394 r180 top
TP19 "Test Point" TP+245X165 44.831,104.394 r180 top
TP20 "Test Point" TP+245X165 47.244,97.155 r180 top
TP21 "Test Point" TP+245X165 44.196,97.155 r180 top
TP22 "Test Point" TP+245X165 50.419,97.155 r0 top
TP24 "Test Point" TP+245X165 82.042,151.13 r0 top
TP25 "Test Point" TP+245X165 90.551,141.097 r0 top
TP26 "Test Point" TP+245X165 85.293,151.123 r0 top
TP_GB "Test Point" TP+245X165 29.464,63.246 r90 top
TP_SOX "Test Point" TP1x1mm 120.315,178.858 r180 top
TP_SWK "Test Point" TP+245X165 130.048,176.911 r90 top
TP_VBK "Test Point" TP+245X165 109.918,178.498 r180 top
TP_VBS "Test Point" TP+245X165 32.004,69.342 r90 top
TP_VBT "Test Point" TP+245X165 46.355,64.643 r0 top
TP_VSYS "Test Point" TP+245X165 49.276,64.77 r0 top
U1 "BQ24074RGTR" QFN50P300X300X100-17N 38.391,67.119 r90 top
U2 "TPS61022RWUR" CONV_TPS61022RWUR 44.958,76.429 r180 top
U3 "CSD25404Q3" TRANS_CSD17308Q3 103.759,163.449 r180 top
U4 "TPS61178RNWR" RNW0013A 97.79,163.237 r90 top
U5 "TPS63001DRCR" VREG_V62/16624-01YE 84.582,165.674 r180 top
U6 "STM32WB55RGV6" VFQFN68-8x8mm 109.22,139.827 r270 top
U7 "DLF162500LT-5028A1" DLF-4_1P6X0P8 99.568,134.747 r90 top
U8 "DMP3028LSD-13" IC_DMP3028LSD-13_DIO-M 27.432,115.622 r90 top
U9 "DMP3028LSD-13" IC_DMP3028LSD-13_DIO-M 46.228,115.749 r90 top
U10 "TLC59581RTQT" RTQ56_4P5X5P2_TEX 56.807,103.137 r90 bottom
U11 "TLC59581RTQT" RTQ56_4P5X5P2_TEX 27.953,103.276 r270 top
U12 "DMP3028LSD-13" IC_DMP3028LSD-13_DIO-M 33.782,115.622 r90 top
U13 "DMP3028LSD-13" IC_DMP3028LSD-13_DIO-M 52.324,115.749 r90 top
U14 "DMP3028LSD-13" IC_DMP3028LSD-13_DIO-M 40.132,115.748 r90 top
U15 "DMP3028LSD-13" IC_DMP3028LSD-13_DIO-M 58.42,115.622 r90 top
U16 "TCRT5000" OPTO_TCRT5000 82.677,141.61 r180 top
U17 "TLV7031DBVR" DBV0005A_M 90.612,146.382 r270 top
U18 "LIS2DW12TR" LGA12R50P4X4_200X200X70 95.377,148.209 r270 top
U19 "TTP223-BA6" SOT23-6 97.409,94.742 r0 top
U20 "MCF8316A1VRGFR" RGF0040E-IPC_B 120.598,174.078 r0 top
X1 "32.768kHz" XTAL_NDK_NX2012SA_2P05X1P20 113.018,148.463 r180 top
X2 "NX2016SA-32MHZ-EXS00A-CS06654" NX2016SA_NDK 103.251,134.112 r180 top
X3 "EC12E24204A2" EC12E24204A2 127.099,95.511 r180 top

## Footprints (in the part's own frame and the unit in brackets; to place one, negate y for a bottom-side part, rotate by r counter-clockwise, add the part's x,y. Pads: shape width x height; smd on the part's side, far side on the other; paste and mask are expansions set on the pad)
2WAY_LP [mil] "2 way low power net tie junction"
  rrect5% 20x12 smd paste-100: 1(-14,0) 2(14,0)
2WAY_MP [mil] "2 way medium power net tie junction"
  rrect5% 40x40 smd paste-100: 1(-30,0) 2(30,0)
AMPHENOL_10129381-906002BLF [mm]
  rect 1.53x1.53 / inner round 1.53 / far side rect 1.53x1.53 hole 1.02: 01(-2.54,-1.27)
  round 1.53 hole 1.02: 02(-2.54,1.27) 03(0,-1.27) 04(0,1.27) 05(2.54,-1.27) 06(2.54,1.27)
  silkscreen extent -4.56,-2.41 3.81,2.41, body extent -3.81,-2.41 6.86,2.41
ANT_PCB_MEANDER_2G4_ST_AN5129 [mil]
  round 1 smd paste-99999 mask+4: 1(0,0)
CAPC1206(3216)100_N [mm] "Chip Capacitor, Body 3.2x1.6mm, Height 1mm, IPC Medium Density"
  rect 1.15x1.8 smd: 1(-1.5,0) 2(1.5,0)
  silkscreen extent -0.55,-0.8 0.55,0.8, body extent -1.7,-0.9 1.7,0.9, height 1
CAPC2012X70 [mm]
  rect 1.3x1.5 smd: 1(-0.95,0) 2(0.95,0)
  body extent -1,-0.63 1,0.63, height 0.7
COAX2_U.FL-R-SMT-101_HIR [mil]
  rect 39x41 smd paste+0 mask+0: 1(0,-60.22)
  rect 41x87 smd paste-43.5 mask-43.5: 2(-58.07,-0.18) 3(58.07,-0.18)
  silkscreen extent -141,-75 34,56
CON5_1X5_TU_TSW [mil]
  round 55 hole 35 paste-99999 mask+0: 1(-200,0) 2(-100,0) 3(0,0) 4(100,0) 5(200,0)
  silkscreen extent -265,-90 265,55, body extent -250,-50 250,50, height 500
CON20_2X10_TR_TSW_SAI [mil]
  round 55 hole 35 paste-99999 mask+0: 1(450,-50) 2(450,50) 3(350,-50) 4(350,50) 5(250,-50) 6(250,50) 7(150,-50) 8(150,50) 9(50,-50) 10(50,50) 11(-50,-50) 12(-50,50) 13(-150,-50) 14(-150,50) 15(-250,-50) 16(-250,50) 17(-350,-50) 18(-350,50) 19(-450,-50) 20(-450,50)
  silkscreen extent -515,-140 515,540
CONN_2X10_TU_SSQ_SAI [mil]
  round 60 hole 40 paste-99999 mask+0: 1(450,-50) 2(450,50) 3(350,-50) 4(350,50) 5(250,-50) 6(250,50) 7(150,-50) 8(150,50) 9(50,-50) 10(50,50) 11(-50,-50) 12(-50,50) 13(-150,-50) 14(-150,50) 15(-250,-50) 16(-250,50) 17(-350,-50) 18(-350,50) 19(-450,-50) 20(-450,50)
  silkscreen extent -510,-140 510,103
CONN_B3B-XH-A_JST [mil]
  round 59 hole 39 paste-99999 mask+0: 1(0,0) 2(-98.43,0) 3(-196.85,0)
  silkscreen extent -298,-97 102,192
CONN_SD-43045-001_02_MOL [mil]
  round 62 hole 42 paste-99999 mask+0: 1(0,0) 2(0,118.11)
  round 120 hole 120 unplated paste-99999 mask+0: 3(0,-170.08)
  silkscreen extent -146,-356 196,44
CONV_TPS61022RWUR [mm]
  rect 1.15x0.35 smd paste-2 mask+0.07: 1(-0.625,0.55) 3(-0.625,-0.55)
  rect 1.45x0.2 smd paste-2 mask+0.07: 2(-0.475,0)
  rect 0.45x0.25 smd mask+0.07: 4(0.975,-0.75) 5(0.975,-0.25) 6(0.975,0.25) 7(0.975,0.75)
  silkscreen extent -1.9,-1.19 1,1.19, body extent -1,-1 1,1, height 1
DBV0005A_M [mm]
  rect 1.2x0.65 smd paste+0 mask+0.051: 1(-1.475,0.95) 2(-1.475,0) 3(-1.475,-0.95) 4(1.475,-0.95) 5(1.475,0.95)
  silkscreen extent -1.63,-1.55 0.38,1.55
DLF-4_1P6X0P8 [mil]
  rect 11x28 smd paste+0 mask+0: 1(-24,0) 3(24,0)
  rect 18x10 smd paste+0 mask+0: 2(0,9) 4(0,-9)
  body extent -33,-16 33,16, height 10